# Altium PCB Relay-Switching-Board-v2.0.PcbDoc (part 1 of 5)
Units mil, origin at the board's own origin, x right, y up, seen from the top; angles counter-clockwise.
Board outline 5905.51 x 4330.71 mil, 4 copper layers (Top Layer, Layer 1, Layer 2, Bottom Layer), stack 62.047 mil thick; 211 components, 133 nets, 602 pads, 336 vias.
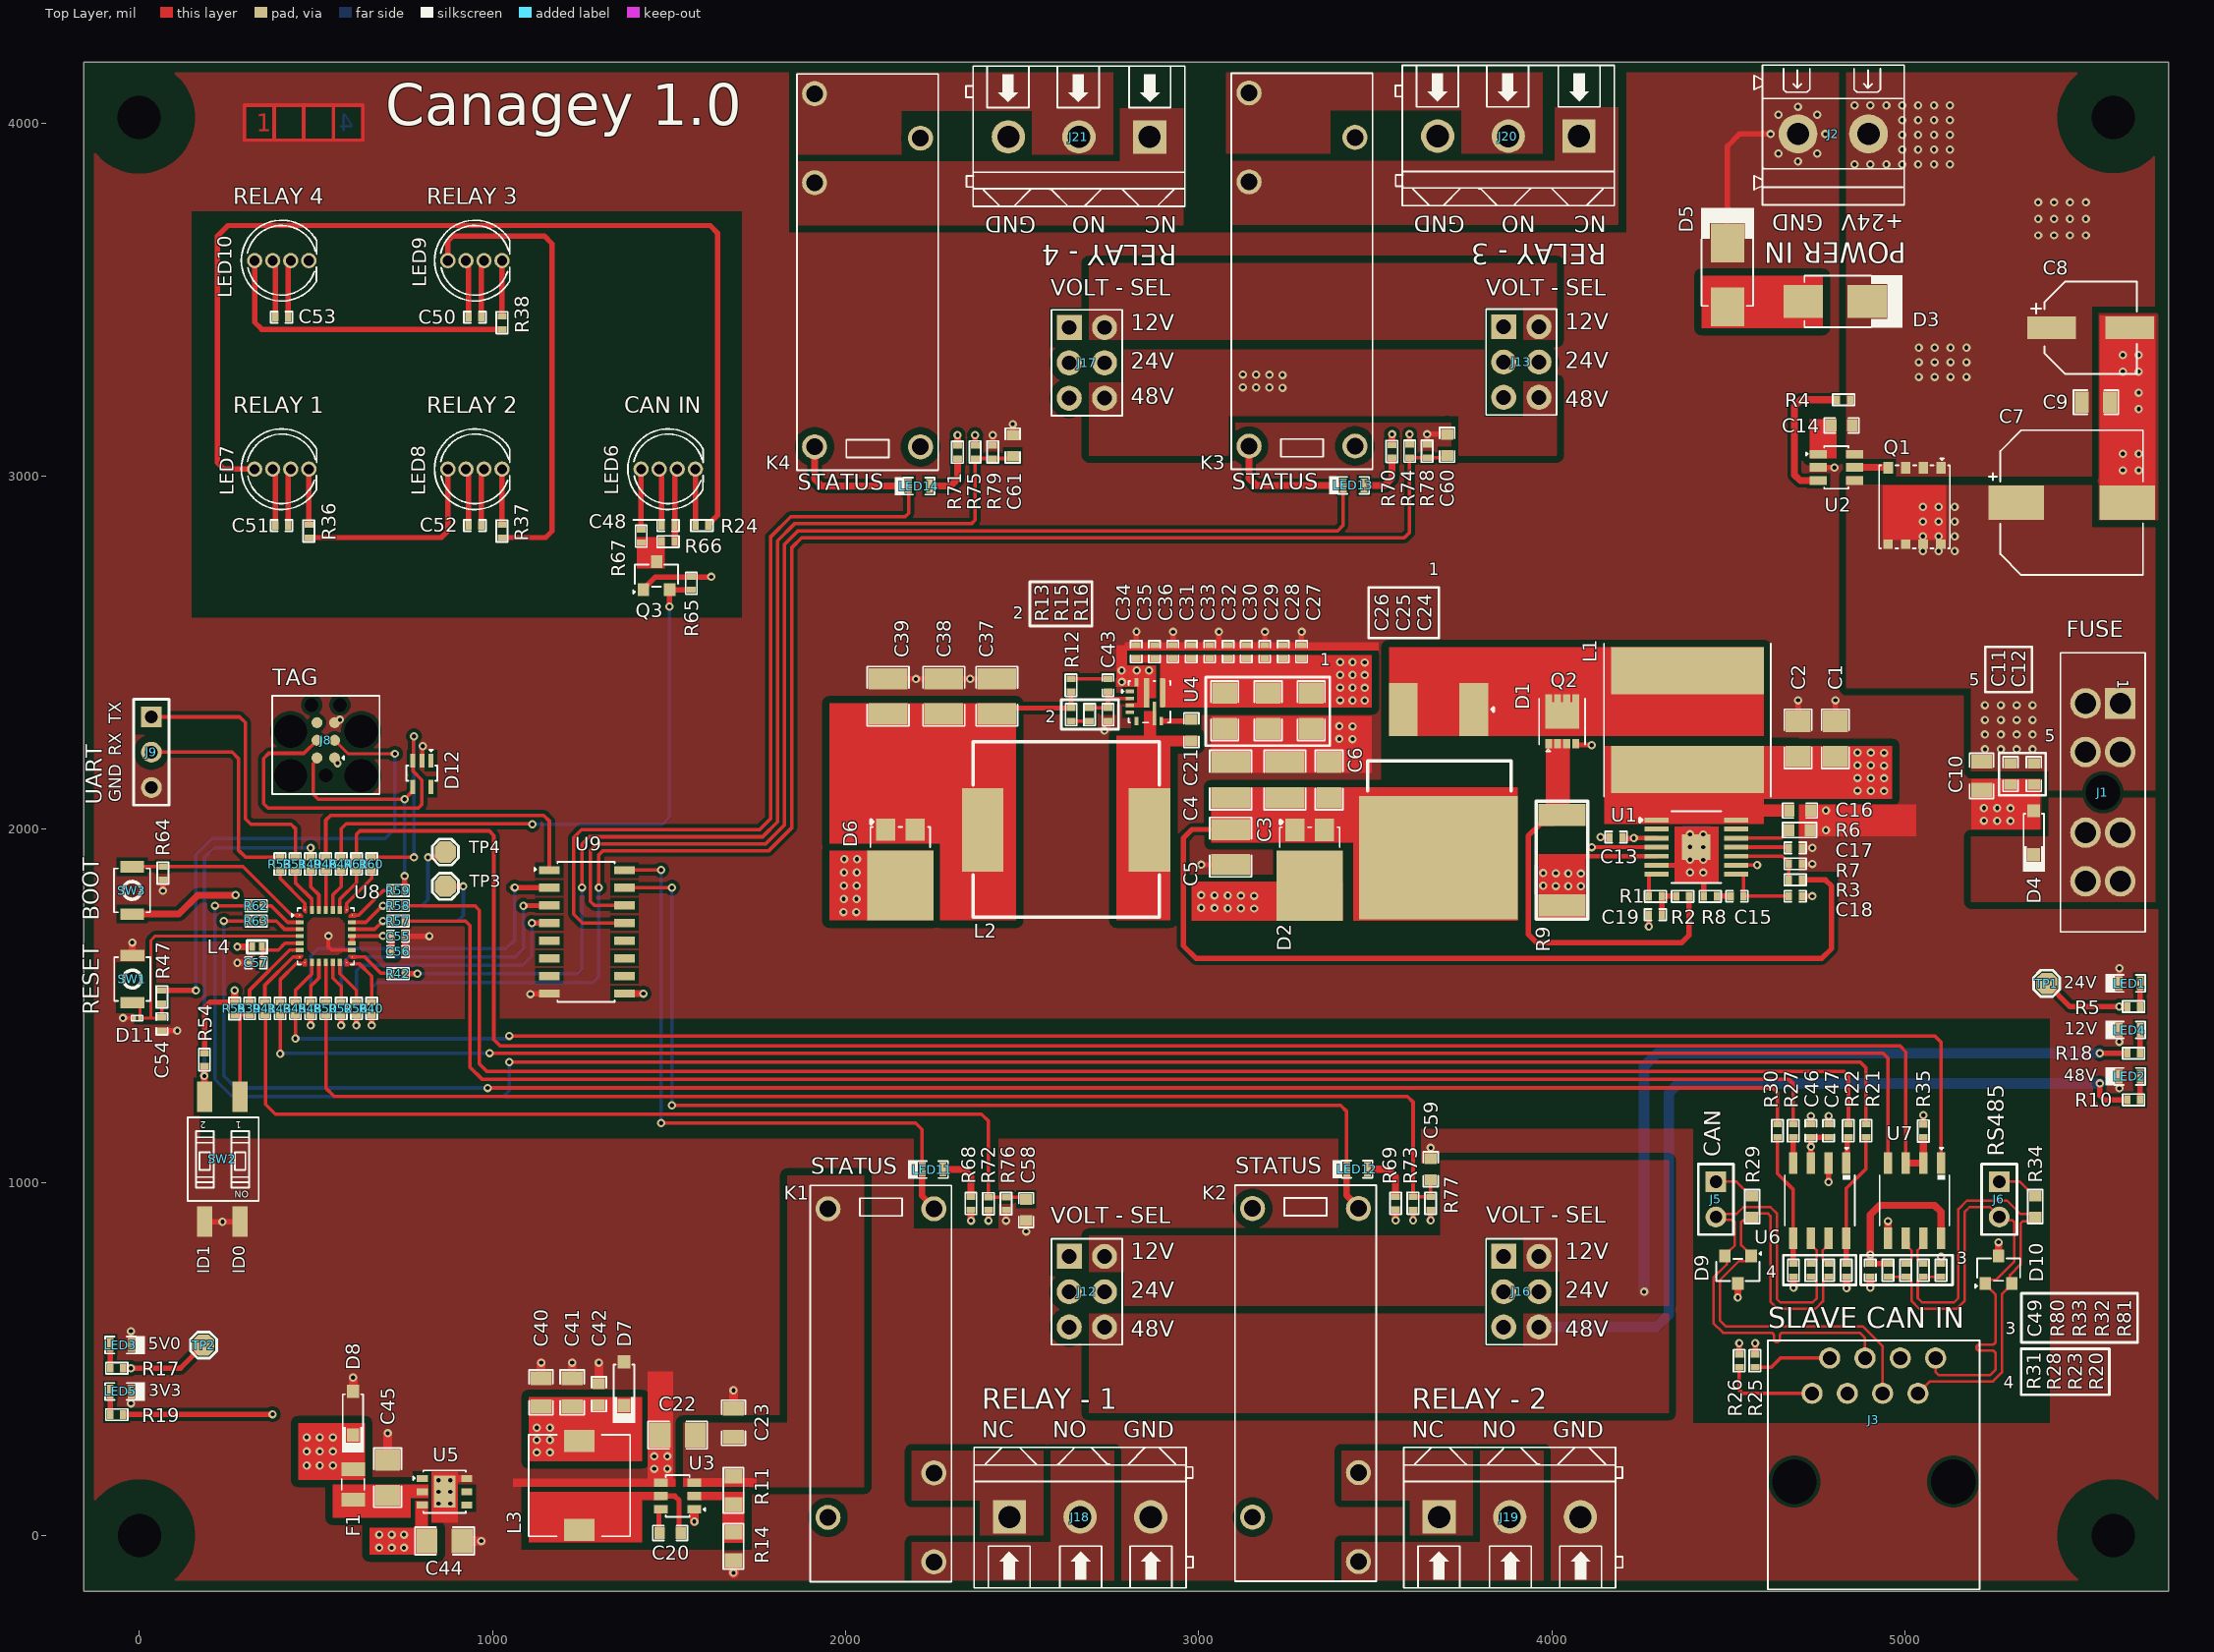
[diagram p0: Top Layer view]
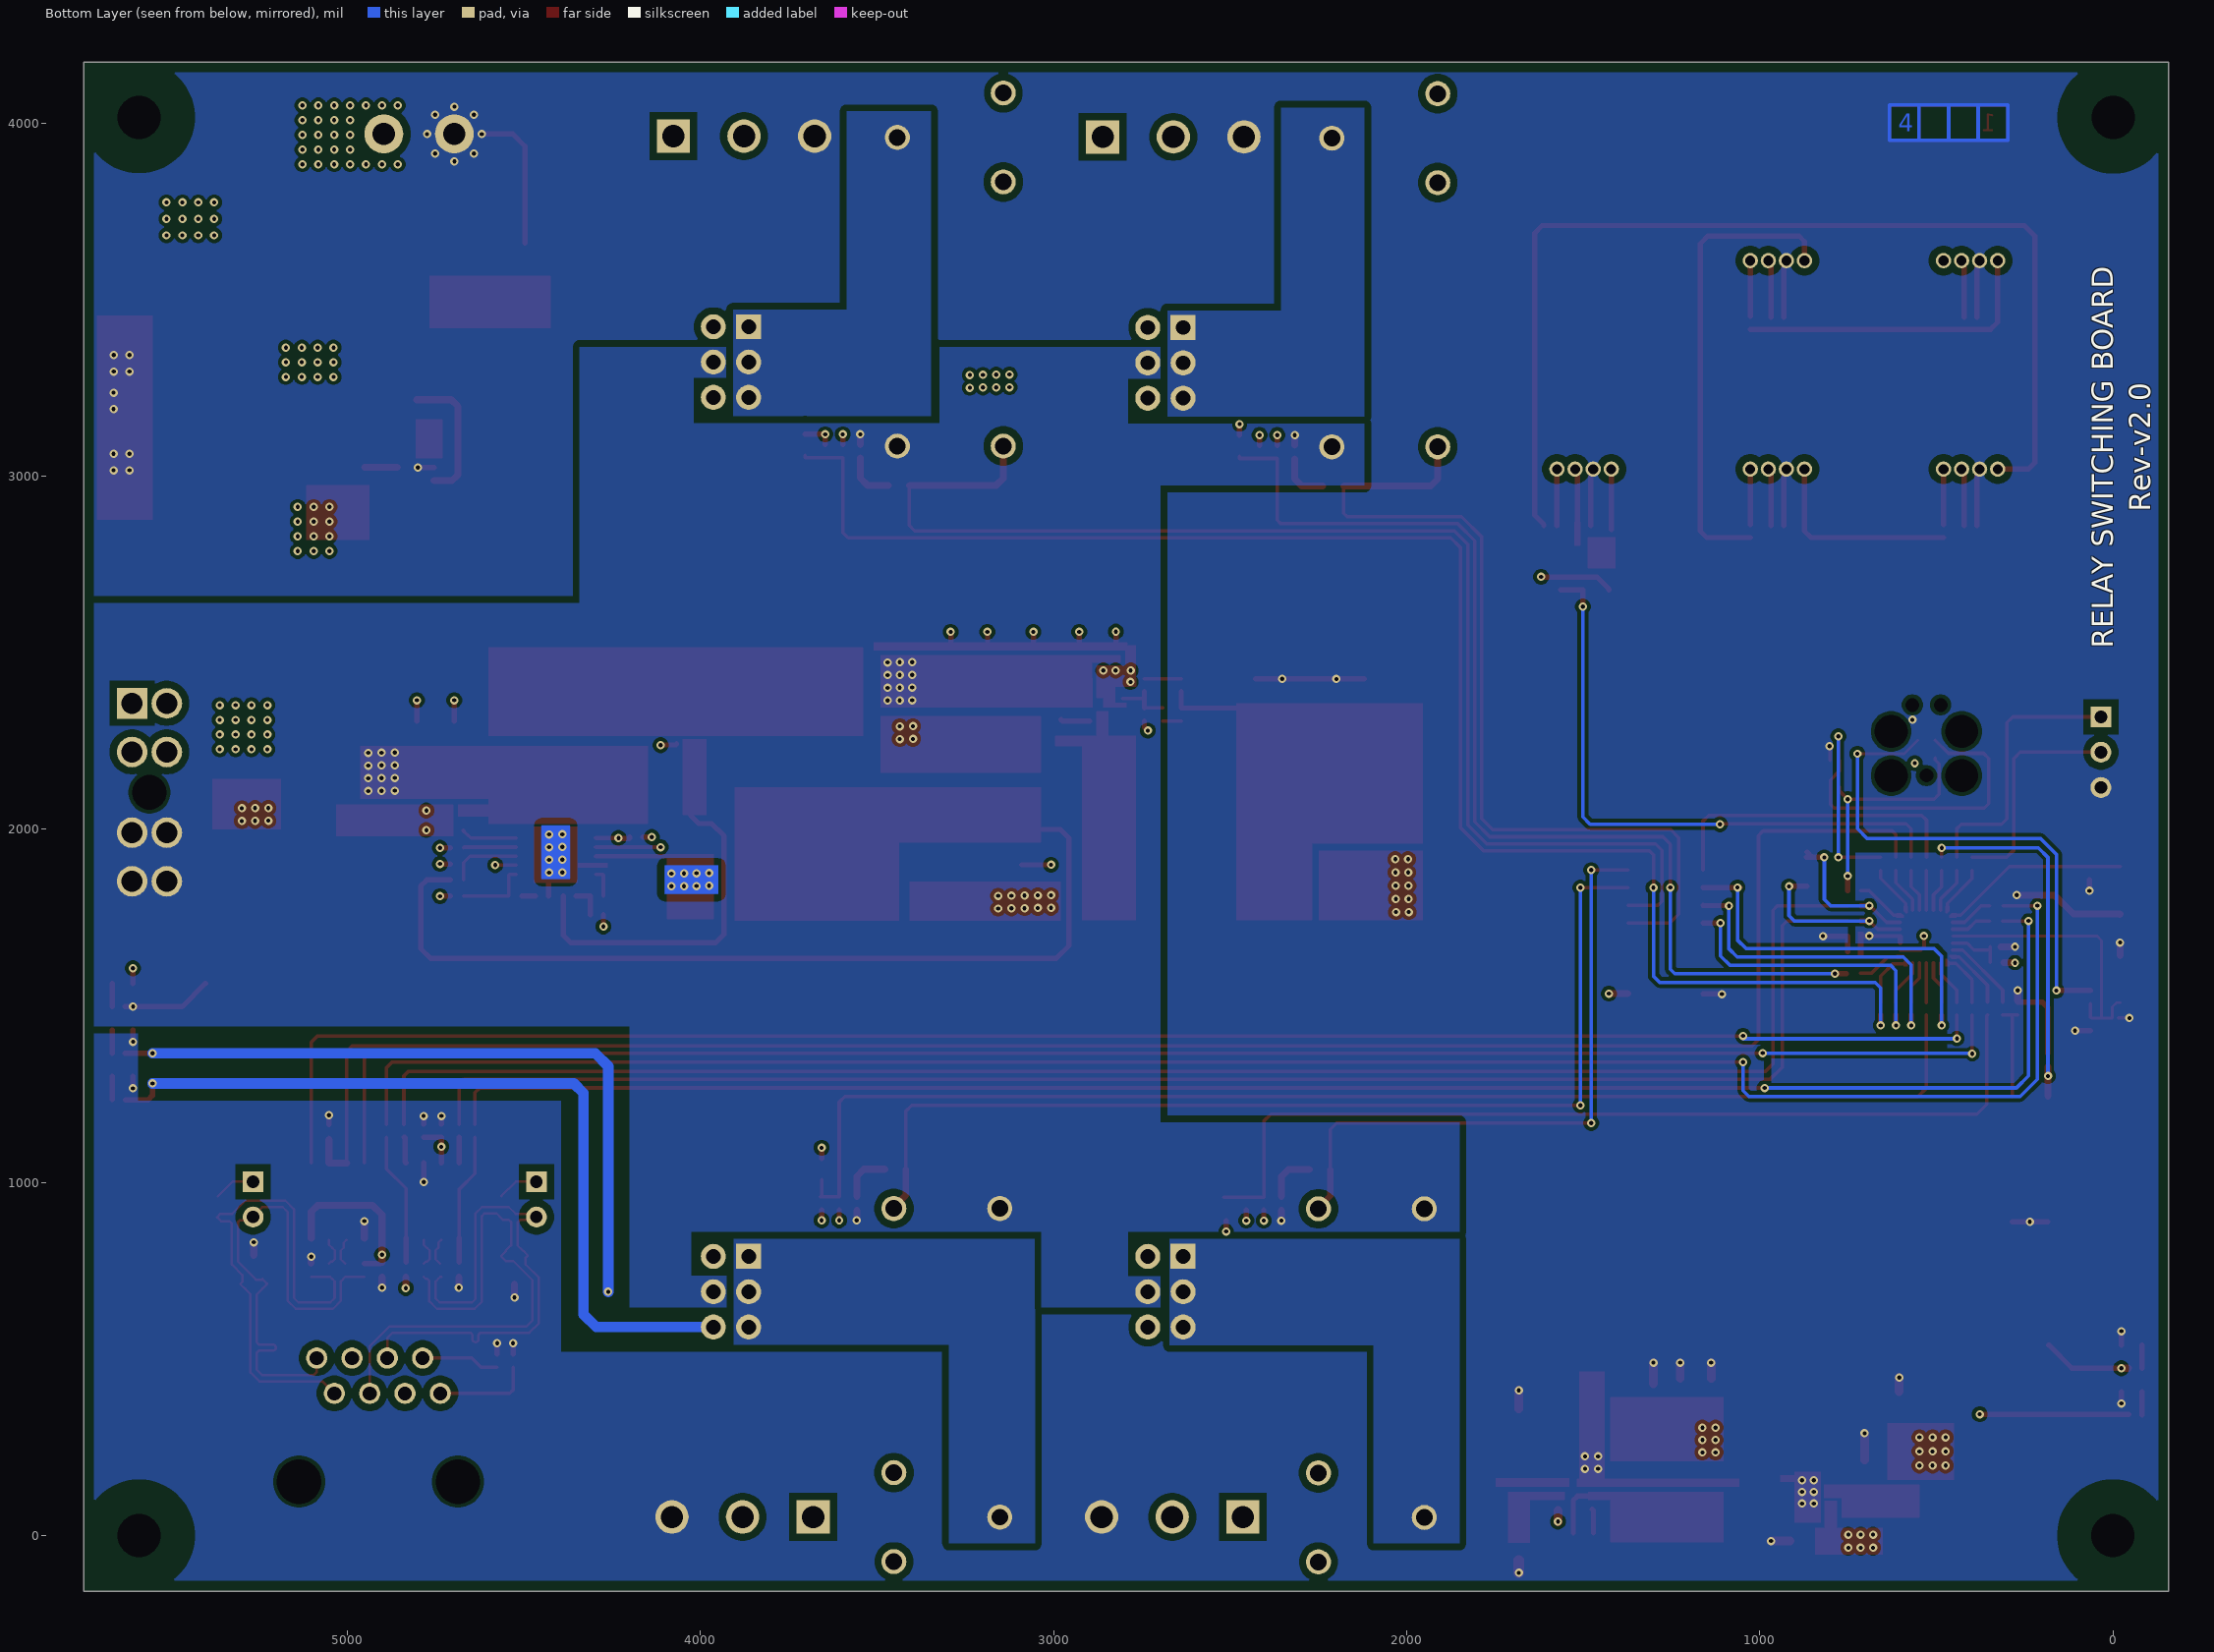
[diagram p1: Bottom Layer view, seen from below]
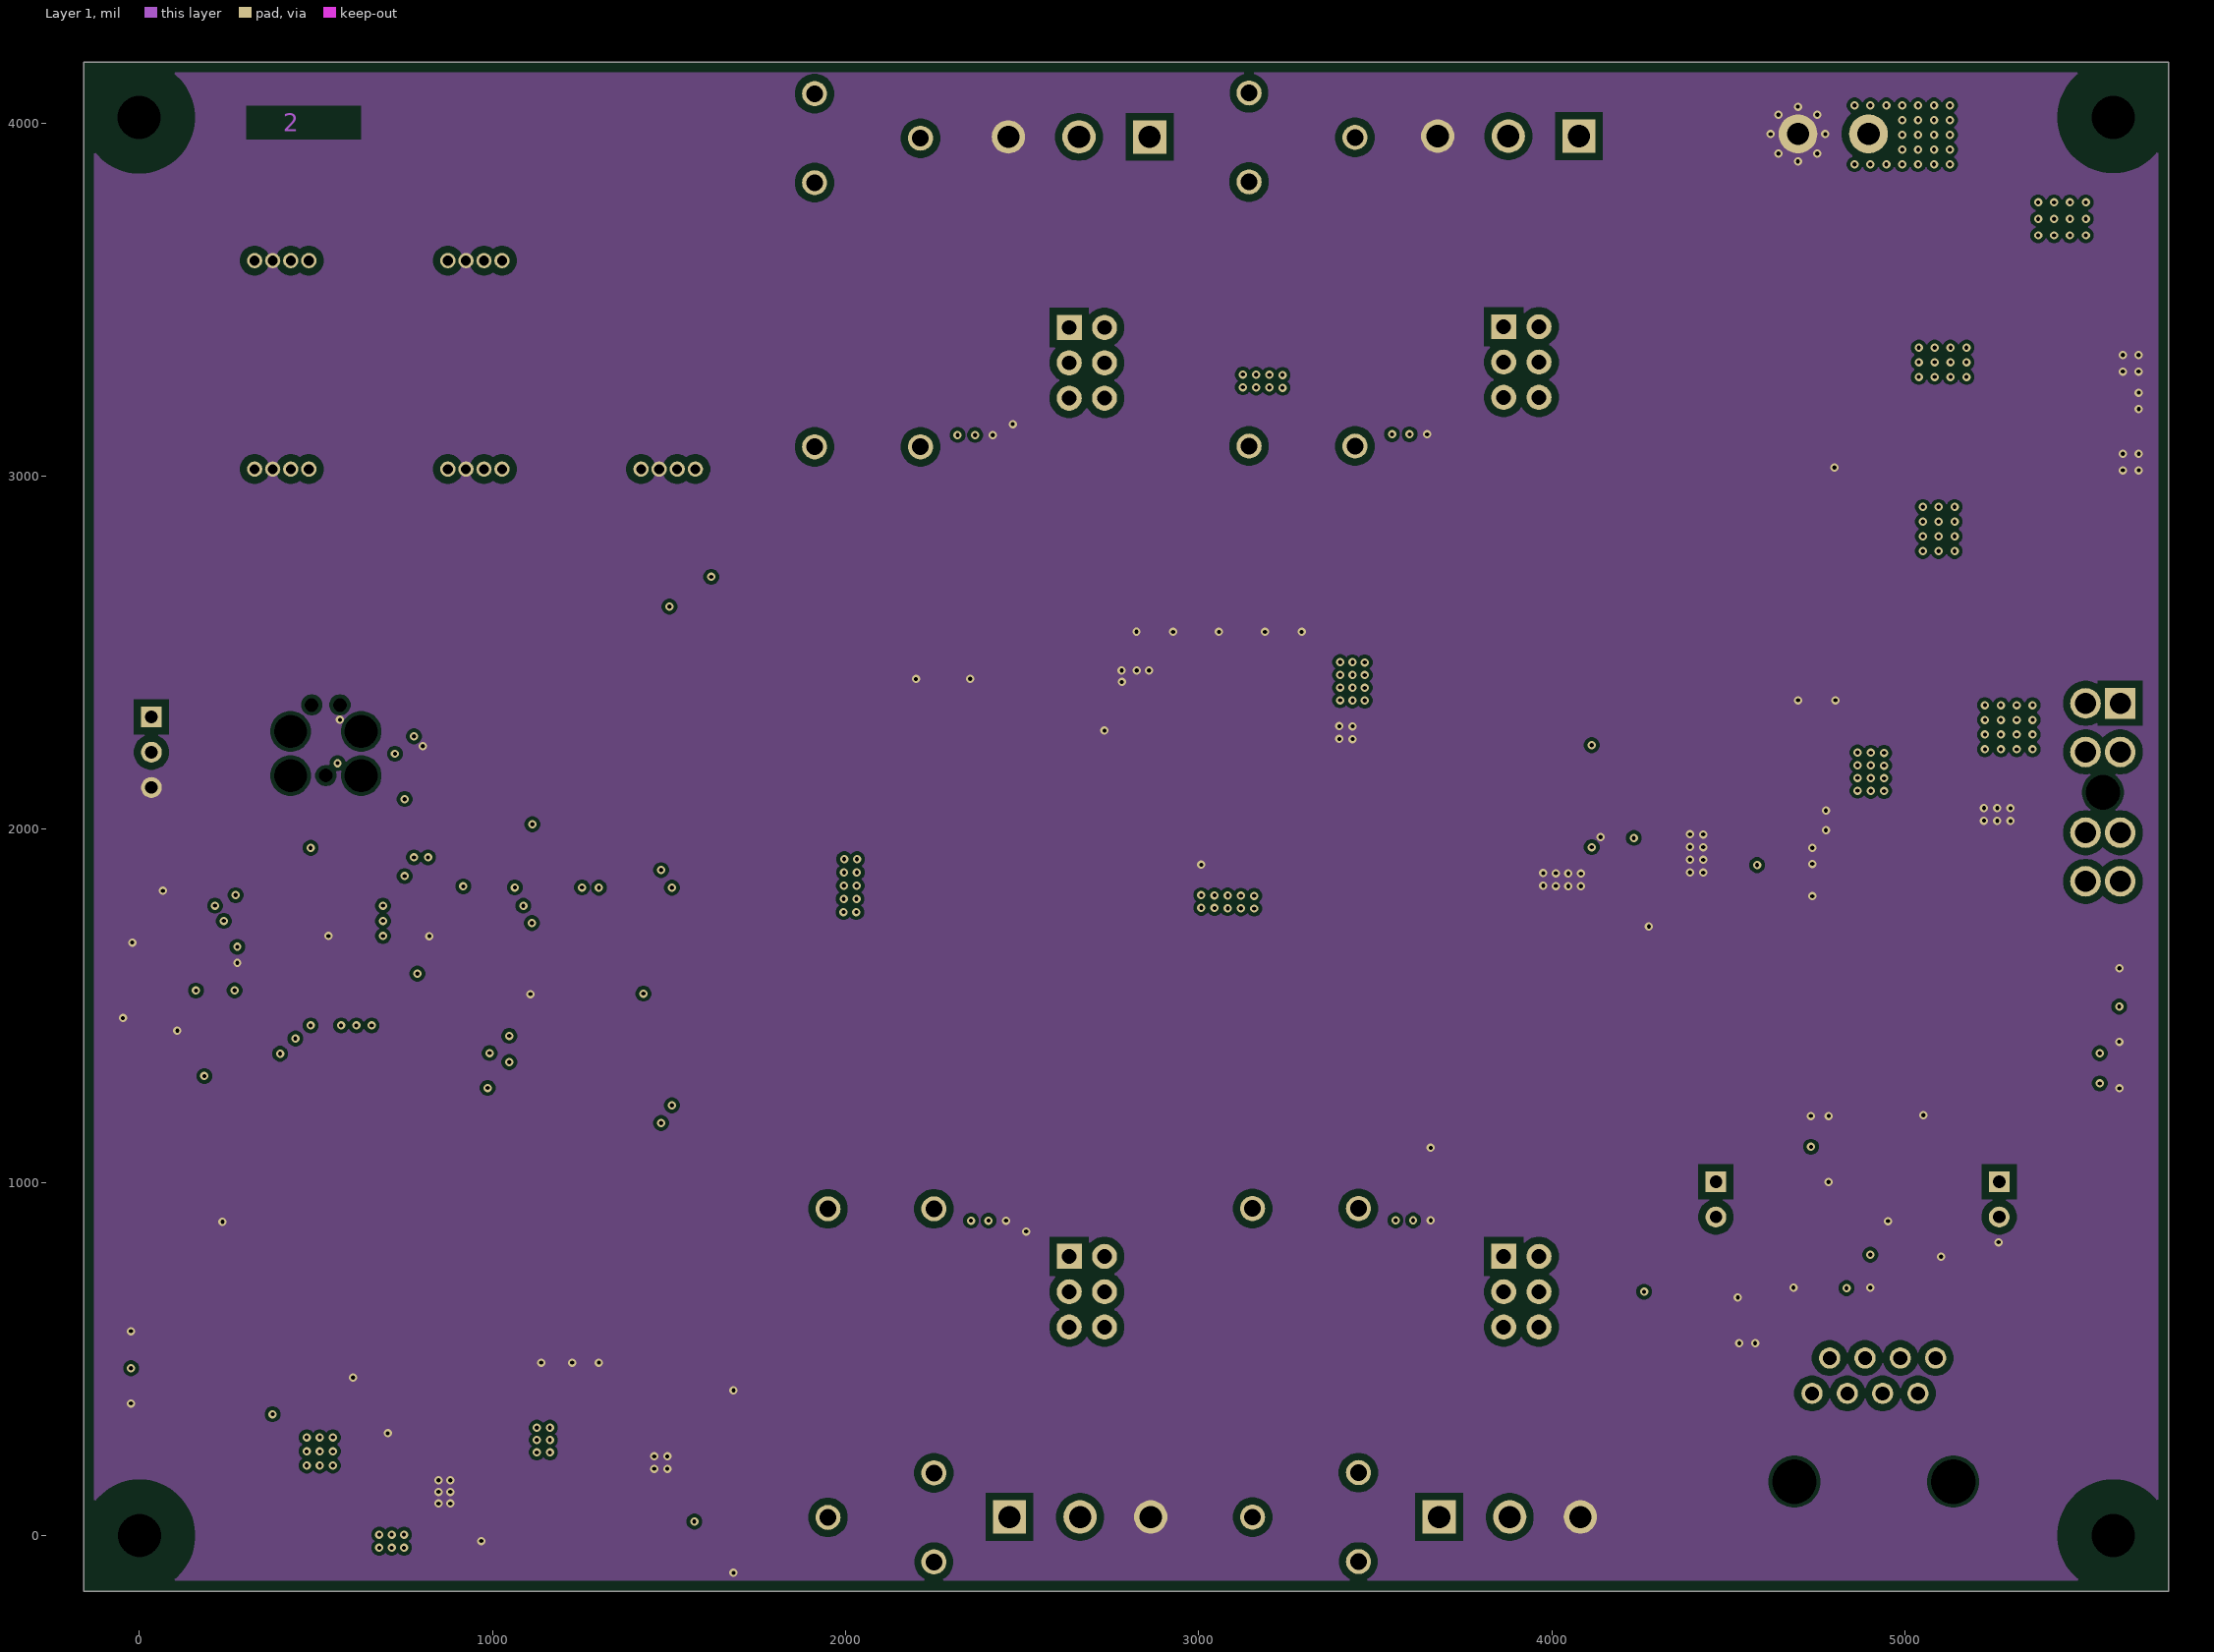
[diagram p2: Layer 1]
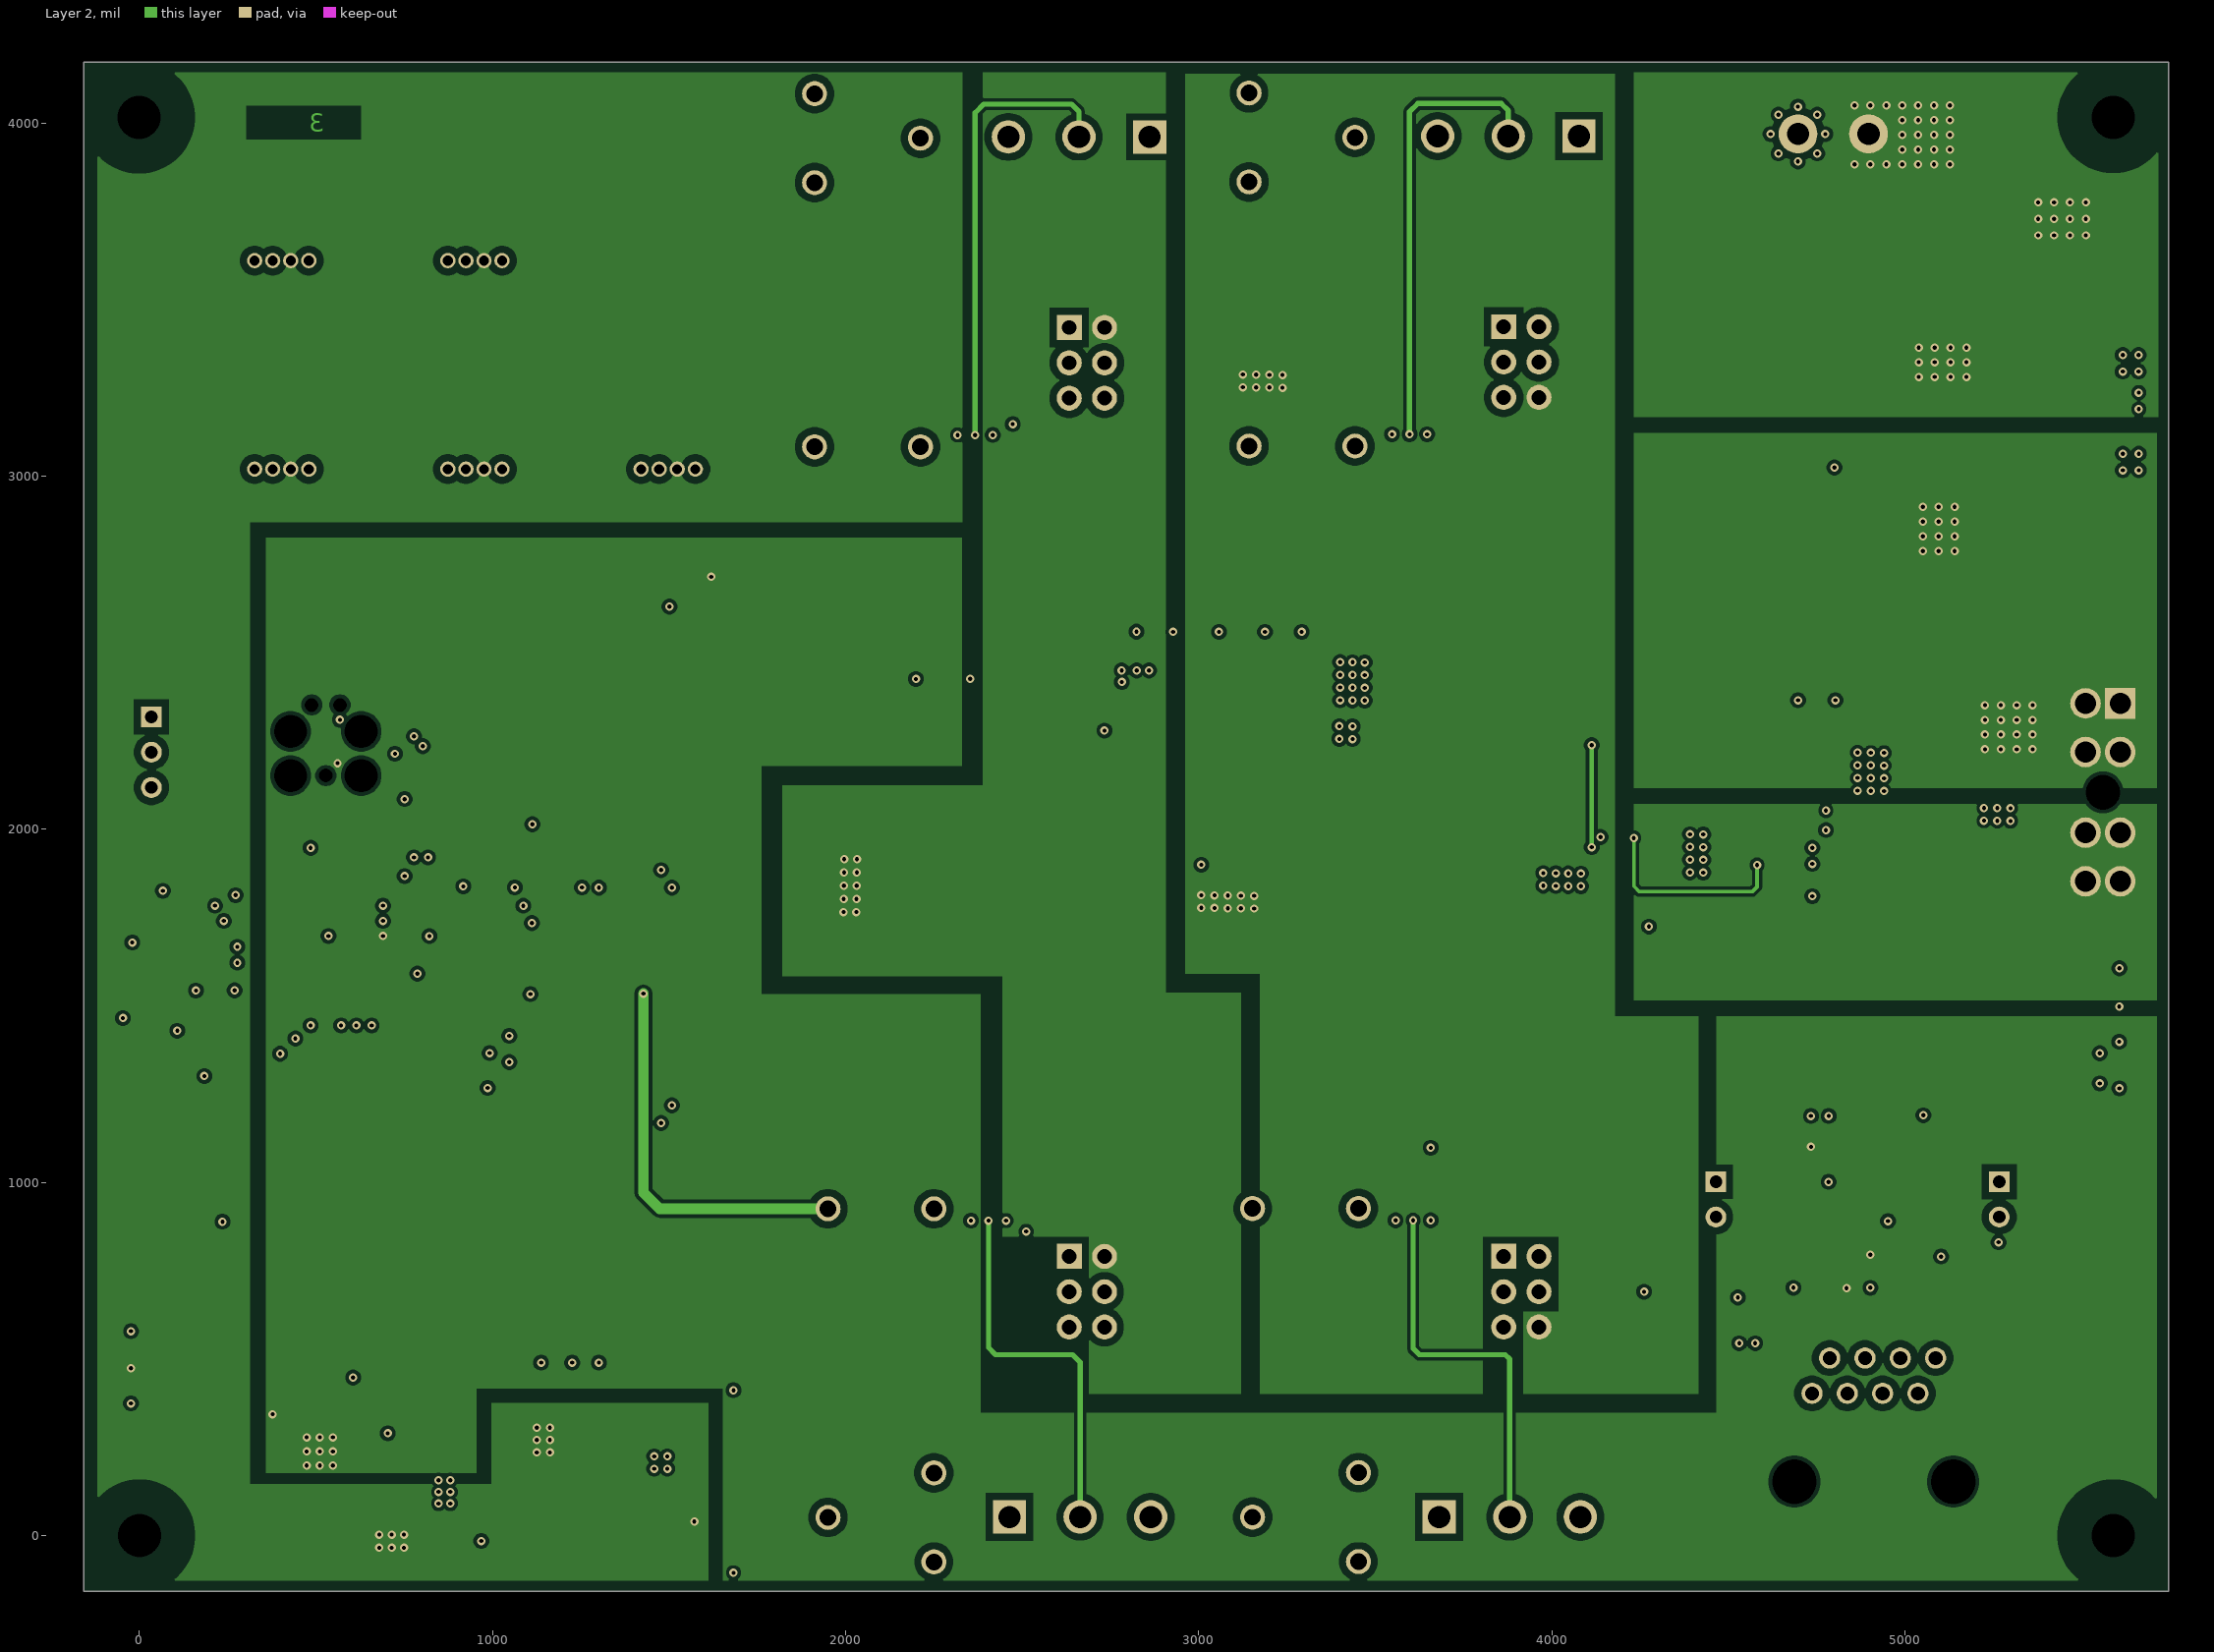
[diagram p3: Layer 2]
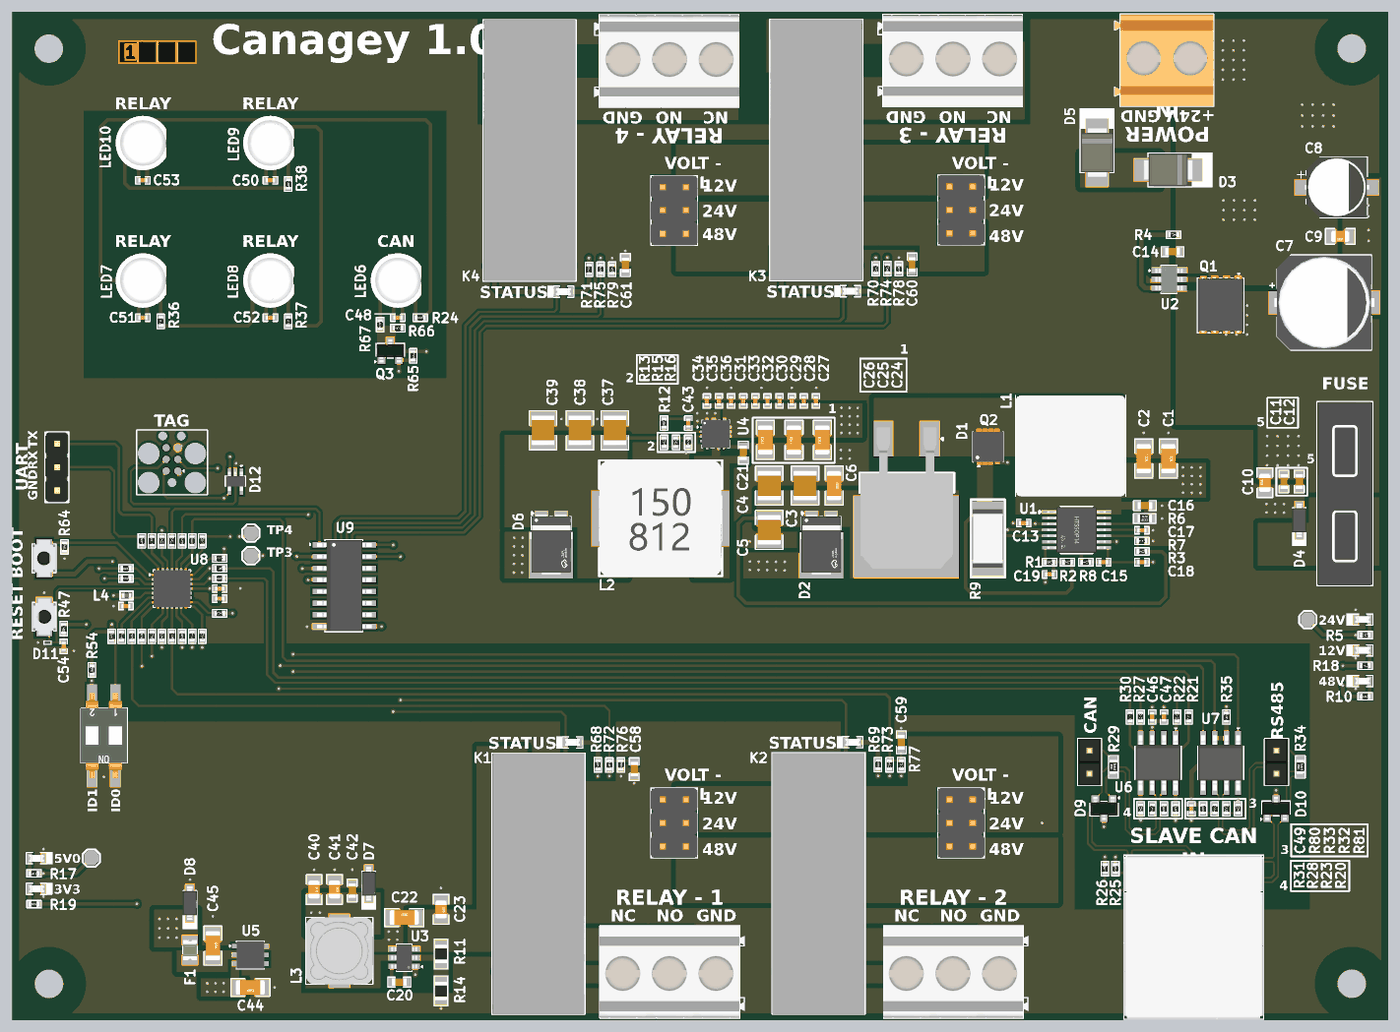
[diagram p6: 3D render of the assembled board from above, using the file's embedded part models]

## Layer stack, top to bottom
Top Solder: solder mask 0.4, Solder Resist, Dk 3.5
Top Layer: signal copper 1.378
Dielectric 2: prepreg 7.992, PP-006, Dk 4.4
Layer 1: signal copper 1.378
Dielectric 1: dielectric 40.551, FR-4, Dk 4.6
Layer 2: signal copper 1.378
Dielectric 3: prepreg 7.992, PP-006, Dk 4.4
Bottom Layer: signal copper 1.378
Bottom Solder: solder mask 0.4, Solder Resist, Dk 3.5

## Board outline
-158.22,-157.48 -158.22,4173.23 5747.3,4173.23 5747.3,-157.48

## Design rules (kind name [scope] priority, off if disabled: settings)
BoardOutlineClearance [All] p1: gap=0 ignorepadtopadclearanceinfootprint=FALSE except(10: Arc-OutlineEdge SMDPad-OutlineEdge THPad-OutlineEdge Via-OutlineEdge Fill-OutlineEdge; 30: Poly-OutlineEdge)
Clearance Clearance_DIFF [InAnyDifferentialPair] p1: gap=10 ignorepadtopadclearanceinfootprint=FALSE except(6: Arc-SMDPad Track-SMDPad SMDPad-SMDPad; 7: Arc-Fill Track-Via Track-Fill Track-Region Track-Text SMDPad-Fill SMDPad-Region THPad-THPad Fill-Fill; 8: Region-Region; 20: THPad-Poly Fill-Poly Poly-Poly Poly-Region)
Clearance [All] p2: gap=10 ignorepadtopadclearanceinfootprint=FALSE except(4: SMDPad-SMDPad; 6: Arc-SMDPad Track-SMDPad; 7: Arc-Fill Track-Track Track-Via Track-Fill Track-Region Track-Text SMDPad-Fill SMDPad-Region THPad-THPad Fill-Fill; 8: Region-Region; 20: THPad-Poly Fill-Poly Poly-Poly Poly-Region)
DiffPairsRouting DIFF_CAN1 [InDifferentialPairClass('DIFF_CAN')] p1: maxlimit=15 minlimit=11 mostfreqgap=15 toplayer_maxgap=11 toplayer_prefgap=11 toplayer_minwidth=7 toplayer_maxwidth=7 toplayer_prefwidth=7 midlayer1_mingap=15 midlayer1_minwidth=4 midlayer1_maxwidth=4 midlayer1_prefwidth=4 midlayer2_mingap=15 midlayer2_minwidth=4 midlayer2_maxwidth=4 midlayer2_prefwidth=4 bottomlayer_maxgap=11 bottomlayer_prefgap=11 bottomlayer_minwidth=7 bottomlayer_maxwidth=7 bottomlayer_prefwidth=7 impedanceprofiledriven=TRUE impedanceprofileid={AF431588-A3C0-40A6-A26B-CB03469C8758} impedanceprofilevalue=120.000000 maxuncoupledlength=500
DiffPairsRouting DIFF_RS485 [InDifferentialPairClass('DIFF_RS485')] p2: maxlimit=15 minlimit=11 mostfreqgap=15 toplayer_maxgap=11 toplayer_prefgap=11 toplayer_minwidth=7 toplayer_maxwidth=7 toplayer_prefwidth=7 midlayer1_mingap=15 midlayer1_minwidth=4 midlayer1_maxwidth=4 midlayer1_prefwidth=4 midlayer2_mingap=15 midlayer2_minwidth=4 midlayer2_maxwidth=4 midlayer2_prefwidth=4 bottomlayer_maxgap=11 bottomlayer_prefgap=11 bottomlayer_minwidth=7 bottomlayer_maxwidth=7 bottomlayer_prefwidth=7 impedanceprofiledriven=TRUE impedanceprofileid={AF431588-A3C0-40A6-A26B-CB03469C8758} impedanceprofilevalue=120.000000 maxuncoupledlength=500
HoleSize [All] p1: absolutevalues=TRUE maxlimit=137.8 minlimit=1 maxpercent=80.000 minpercent=20.000
MinimumSolderMaskSliver [All] p1: minsoldermaskwidth=0
PolygonConnect [All] p1: connectstyle=Direct reliefconductorwidth=10 reliefentries=4 polygonreliefangle="90 Angle" airgapwidth=10
RoutingVias [All] p1: holewidth=11.81 width=23.62 viastyle="Through Hole" minholewidth=7.87 minwidth=15.75 maxholewidth=11.81 maxwidth=23.62
SilkToSilkClearance [All] p1: silktosilkclearance=0
SilkToSolderMaskClearance [IsPad] p1: minsilkscreentomaskgap=0 clearancetoexposedcopper=TRUE
SolderMaskExpansion [All] p1: expansion=4 istentingtop=FALSE
SupplyNets "Schematic Supply Nets_11" [InNet('REL-PWR-1')] p1: voltage=0.000
SupplyNets "Schematic Supply Nets_10" [InNet('REL-PWR-3')] p2: voltage=0.000
SupplyNets "Schematic Supply Nets_5" [InNet('REL-PWR-4')] p3: voltage=0.000
SupplyNets "Schematic Supply Nets_2" [InNet('REL-PWR-2')] p4: voltage=0.000
SupplyNets "Schematic Supply Nets_1" [InNet('12V')] p5: voltage=0.000
SupplyNets "Schematic Supply Nets" [InNet('48V')] p6: voltage=0.000
SupplyNets "Schematic Supply Nets_9" [InNet('3V3')] p7: voltage=0.000
SupplyNets "Schematic Supply Nets_8" [InNet('VIN')] p8: voltage=0.000
SupplyNets "Schematic Supply Nets_7" [InNet('GND')] p9: voltage=0.000
SupplyNets "Schematic Supply Nets_6" [InNet('24V')] p10: voltage=0.000
SupplyNets "Schematic Supply Nets_4" [InNet('5V')] p11: voltage=0.000
SupplyNets "Schematic Supply Nets_3" [InNet('AVDD')] p12: voltage=0.000
Width [All] p1: maxlimit=50 minlimit=4 preferedwidth=6 minimp=50.000000 maximp=50.000000 favimp=50.000000
25 further rules are at their usual default settings.

## Classes and differential pairs
component class U_Relay-Sheet: C58 C59 C60 C61 J12 J13 J15 J16 J17 J18 J19 J20 J21 K1 K2 K3 K4 LED11 LED12 LED13 LED14 R68 R69 R70 R71 R72 R73 R74 R75 R76 R77 R78 R79 U9
component class U_Controller-Sheet: C54 C55 C56 C57 D11 D12 J8 J9 L4 Q3 R39 R40 R41 R42 R43 R44 R45 R46 R47 R48 R49 R50 R51 R52 R53 R54 R55 R56 R57 R58 R59 R60 R61 R62 R63 R64 R65 R66 R67 SW1 SW2 SW3 TP3 TP4 U8
differential pair class DIFF_RS485: RS485
differential pair class DIFF_CAN: CAN1
component class U_Power-Sheet: C1 C2 C3 C4 C5 C6 C7 C8 C9 C10 C11 C12 C13 C14 C15 C16 C17 C18 C19 C20 C21 C22 C23 C24 C25 C26 C27 C28 C29 C30 C31 C32 C33 C34 C35 C36 C37 C38 C39 C40 C41 C42 C43 C44 C45 D1 D2 D3 D4 D5 D6 D7 D8 F1 J1 J2 L1 L2 L3 LED1 LED2 LED3 LED4 LED5 Q1 Q2 R1 R2 R3 R4 R5 R6 R7 R8 R9 R10 R11 R12 R13 R14 R15 R16 R17 R18 R19 TP1 TP2 U1 U2 U3 U4 U5
component class U_Comms-Sheet: C46 C47 C48 C49 C50 C51 C52 C53 D9 D10 J3 J5 J6 LED6 LED7 LED8 LED9 LED10 R20 R21 R22 R23 R24 R25 R26 R27 R28 R29 R30 R31 R32 R33 R34 R35 R36 R37 R38 R80 R81 U6 U7
differential pair RS485: +RS485_P -RS485_N
differential pair CAN1: +CAN1_P -CAN1_N

## Components (designator, comment, footprint, x,y, rotation, side; value= is the part's Value field where it differs from the comment)
C1 "4.7uF" Cap-1206 4803.16,2255.88 r270 top
C2 "4.7uF" Cap-1206 4697.57,2255.88 r270 top
C3 "10uF" Cap-1210 3244.39,2139.54 r270 top
C4 "10uF" Cap-1210 3090.4,2139.53 r270 top
C5 "10uF" Cap-1210 3090.4,1949.62 r90 top
C6 "1uF" Cap-1206 3369.22,2139.53 r270 top
C7 "220uF" UCD-220uF-10mmDia 5472.2,2925.26 r0 top
C8 "47uF" RVT1H470M0607 5526.24,3420.47 r0 top
C9 "22nF" Cap-0805 5540.97,3209.77 r180 top
C10 "10uF" Cap-0805 5217.29,2151.77 r90 top
C11 "1uF" Cap-0603 5298.98,2156.77 r90 top
C12 "0.1uF" Cap-0603 5364.99,2156.76 r90 top value=100nF
C13 "1uF" Cap-0402 4182.26,1978.12 r0 top
C14 "1uF" Cap-0603 4821.19,3143.98 r0 top
C15 "33nF" Cap-0402 4524.66,1810.66 r0 top
C16 "0.1uF" Cap-0603 4702.57,2053.45 r180 top value=100nF
C17 "0.1uF" Cap-0402 4689.57,1947.51 r180 top
C18 "68nF" Cap-0402 4689.57,1810.66 r180 top
C19 "1nF" Cap-0402 4293.48,1757.88 r0 top
C20 "0.1uF" Cap-0603 1503.09,7.6 r180 top value=100nF
C21 "100nF" Cap-0603 2979.12,2280.57 r90 top
C22 "4.7uF" Cap-1206 1524.41,284.53 r0 top
C23 "10uF" Cap-0805 1682.37,319.54 r270 top
C24 "4.7uF" Cap-1206 3318.62,2335.61 r90 top
C25 "4.7uF" Cap-1206 3196.75,2335.61 r90 top
C26 "4.7uF" Cap-1206 3073.75,2335.61 r90 top
C27 "10nF" Cap-0402 3291.11,2503.03 r270 top
C28 "10nF" Cap-0402 3239.09,2503.08 r270 top
C29 "10nF" Cap-0402 3187.06,2503.08 r270 top
C30 "10nF" Cap-0402 3135.04,2503.04 r270 top
C31 "10nF" Cap-0402 2978.96,2503.08 r270 top
C32 "10nF" Cap-0402 3083.01,2503.05 r270 top
C33 "10nF" Cap-0402 3030.99,2503.06 r270 top
C34 "10nF" Cap-0402 2822.88,2503.08 r270 top
C35 "10nF" Cap-0402 2874.91,2503.07 r270 top
C36 "10nF" Cap-0402 2926.93,2503.08 r270 top
C37 "22uF" Cap-1210 2428.16,2376.76 r270 top
C38 "22uF" Cap-1210 2278.16,2376.76 r270 top
C39 "22uF" Cap-1210 2120.13,2376.76 r270 top
C40 "22uF" Cap-0805 1137.61,405.46 r270 top
C41 "22uF" Cap-0805 1225.61,405.46 r270 top
C42 "0.1uF" Cap-0603 1301.24,400.46 r270 top value=100nF
C43 "100pF" Cap-0402 2743.15,2408.06 r90 top
C44 "4.7uF" Cap-1206 864.15,-15.3 r180 top
C45 "4.7uF" Cap-1206 703.4,164.04 r270 top
C46 "0.1uF" Cap-0402 4733.49,1146.34 r270 top value=100nF
C47 "4.7uF" Cap-0402 4784,1146.34 r270 top
C48 "0.1uF" Cap-0402 1497.28,2860.63 r0 top value=100nF
C49 "0.1uF" Cap-0402 4902,751.33 r90 top value=100nF
C50 "0.1uF" Cap-0402 950.17,3450.64 r0 top value=100nF
C51 "0.1uF" Cap-0402 403.05,2860.63 r0 top value=100nF
C52 "0.1uF" Cap-0402 950.17,2860.63 r0 top value=100nF
C53 "0.1uF" Cap-0402 403.04,3450.63 r0 top value=100nF
C54 "0.1uF" Cap-0402 63.48,1449.02 r90 top value=100nF
C55 "0.1uF" Cap-0402 732.76,1697.44 r0 top value=100nF
C56 "0.1uF" Cap-0402 732.77,1654.26 r0 top value=100nF
C57 "0.1uF" Cap-0402 330.26,1622.26 r180 top value=100nF
C58 "0.1uF" Cap-0603 2511.22,921.97 r90 top
C59 "0.1uF" Cap-0603 3656.95,1037.49 r270 top
C60 "0.1uF" Cap-0603 3703.68,3088.85 r270 top
C61 "0.1uF" Cap-0603 2473.28,3086.71 r270 top
D1 "STPS20M100SG-TR" D2Pak. 3679.26,2129.53 r180 top
D2 "V25PN60-M3/86A" TO-277A 3314.26,1919.49 r90 top
D3 "SMBJ58A-13-F" SMB_ 4802.47,3494.95 r0 top
D4 "AZ4024-01G" SOD-123 5364.99,1990.63 r270 top
D5 "SMBJ26A-13-F" SMB_ 4497.29,3569.63 r90 top
D6 "V25PN60-M3/86A" TO-277A 2155.09,1919.79 r90 top
D7 "AZ3005-01G" SOD-123 1372.26,429.96 r270 top
D8 "AZ3003-01G" SOD-123 604.64,346.23 r270 top
D9 "CDSOT23-T24CAN-Q" SOT-23 4527.07,752.72 r180 top
D10 "SM712" SOT-23 5265.29,752.72 r0 top
D11 "ESDM2033MX4T5G" DFN-2(0.3x0.6) -6.77,1465.51 r0 top
D12 "ESDALC6V1W5" SOT-323-5 800.02,2157.44 r270 top
F1 "0805L110SLYR" Fuse-0805 605.14,144.93 r90 top
J1 "178.6165.0002" 178.6165.0002 5560.76,2104.8 r270 top
J2 "DB128L-5.08-2P-OG-S" DB128L-5.08-2P-OG-S 4796.96,3969.34 r0 top
J3 "HC-RJ45-5622-1-6-Y" HC-RJ45-5622-1-6-Y 4911.95,327.73 r0 top
J5 "X6511WV-02H-C60D30" HDR1X2_ 4464.73,1002.24 r270 top
J6 "X6511WV-02H-C60D30" HDR1X2_ 5266.95,1002.24 r270 top
J8 "TC2030-IDC" TC2030-IDC_ 528.02,2252.22 r90 top
J9 "X6511WV-03H-C60D30" HDR1X3_ 34.02,2318.5 r270 top
J12 "X6521WV-2x03H-C60D30" X6521WV-2x03H-C60D30 2683.27,690.57 r270 top
J13 "X6521WV-2x03H-C60D30" X6521WV-2x03H-C60D30 3913.68,3323.26 r270 top
J16 "X6521WV-2x03H-C60D30" X6521WV-2x03H-C60D30 3913.68,690.57 r270 top
J17 "X6521WV-2x03H-C60D30" X6521WV-2x03H-C60D30 2683.27,3321.12 r270 top
J18 "DB128L-5.08-3P-GY-S" DB128L-5.08-3P-GY-S 2664,52.77 r0 top
J19 "DB128L-5.08-3P-GY-S" DB128L-5.08-3P-GY-S 3880.84,52.77 r0 top
J20 "DB128L-5.08-3P-GY-S" DB128L-5.08-3P-GY-S 3876.88,3963.06 r180 top
J21 "DB128L-5.08-3P-GY-S" DB128L-5.08-3P-GY-S 2660.9,3960.92 r180 top
K1 "G6RN-1-DC24" "G6RN-1 DC24" 2100.07,425.46 r0 top
K2 "G6RN-1-DC24" "G6RN-1 DC24" 3302.49,426.31 r0 top
K3 "G6RN-1-DC24" "G6RN-1 DC24" 3292.54,3585.37 r180 top
K4 "G6RN-1-DC24" "G6RN-1 DC24" 2062.13,3583.23 r180 top
L1 "15uH" FEXL1010A-150M 4384.26,2309.53 r90 top
L2 "6.8uH" MWSA1206S-6R8MT 2624.38,1998.53 r180 top
L3 "4.7uH" YPRH0703-4R7M 1245.87,141.61 r90 top
L4 "BLM15AG601SN1D" IND-0402 333.26,1667.45 r180 top
LED1 "RED" LED-0603 5636.77,1563.93 r180 top
LED2 "RED" LED-0603 5636.78,1300.22 r180 top
LED3 "RED" LED-0603 -53.18,539.63 r0 top
LED4 "RED" LED-0603 5636.77,1431.94 r180 top
LED5 "RED" LED-0603 -53.18,407.91 r0 top
LED6 "WS2812D-F5" WS2812D-F5 1497.53,3020.08 r0 top
LED7 "WS2812D-F5" WS2812D-F5 403.04,3020.08 r0 top
LED8 "WS2812D-F5" WS2812D-F5 950.28,3020.08 r0 top
LED9 "WS2812D-F5" WS2812D-F5 950.28,3610.63 r0 top
LED10 "WS2812D-F5" WS2812D-F5 403.04,3610.63 r0 top
LED11 "Blue" LED-0603 2246.23,1036.63 r180 top
LED12 "Blue" LED-0603 3448.65,1037.49 r180 top
LED13 "Blue" LED-0603 3438.54,2974.19 r180 top
LED14 "Blue" LED-0603 2208.13,2972.06 r180 top
Q1 "CSD18531Q5A" "8-VSONP (5x6)" 5027.2,2915.72 r270 top
Q2 "CSD19537Q3" "8-VSON-CLIP (3.3x3.3)" 4029.26,2305.53 r90 top
Q3 "Si2302CDS" Sot-23 1464.42,2718.07 r0 top
R1 "348R" Res-0402 4293.52,1810.66 r0 top
R2 "100R" Res-0402 4370.42,1810.67 r0 top
R3 "120K" Res-0402 4689.57,1856.7 r0 top
R4 "100K" Res-0402 4826.19,3216.38 r180 top
R5 "3.9K" Res-0402 5647.72,1497.94 r0 top value=3.9kR
R6 "48.7K" Res-0603 4701.57,1997.91 r180 top
R7 "2.49K" Res-0402 4689.57,1902.11 r180 top value=2.49kR
R8 "2.94K" Res-0402 4448.83,1810.66 r0 top
R9 "12mR" RES-2512 4028.72,1912.49 r90 top
R10 "10K" Res-0402 5647.73,1234.5 r0 top
R11 "698K" RES-0805 1682.37,128.04 r90 top value=698kR
R12 "20K" Res-0402 2638.78,2408.07 r270 top value=20kR
R13 "2.87k" Res-0402 2638.78,2325.08 r90 top
R14 "51.1K" RES-0805 1682.23,-30.39 r90 top value=51.1kR
R15 "191K" Res-0402 2690.65,2325.08 r270 top value=191kR
R16 "10K" Res-0402 2743.16,2325.08 r90 top
R17 "499R" Res-0402 -64.12,473.9 r180 top
R18 "2K" Res-0402 5647.72,1366.21 r0 top value=2kR
R19 "240R" Res-0402 -64.12,342.18 r180 top
R20 "10K" Res-0402 4833.99,751.34 r270 top
R21 "0R" Res-0402 4889.99,1146.34 r270 top
R22 "0R" Res-0402 4839.99,1146.34 r270 top
R23 "0R" Res-0402 4784,751.34 r270 top
R24 "75R" Res-0402 1593.05,2860.63 r0 top
R25 "0R" Res-0402 4575.91,495 r270 top
R26 "0R" Res-0402 4530.91,495 r270 top
R27 "0R" Res-0402 4683.99,1146.34 r270 top
R28 "0R" Res-0402 4733.99,751.34 r270 top
R29 "120R" Res-0603 4567.11,931.77 r270 top
R30 "0R" Res-0402 4638.99,1146.34 r270 top
R31 "10K" Res-0402 4683.99,751.34 r90 top
R32 "0R" Res-0402 5052.29,751.33 r270 top
R33 "0R" Res-0402 5002.29,751.34 r270 top
R34 "120R" Res-0603 5369.32,931.77 r270 top
R35 "10K" Res-0402 5052.26,1145.85 r90 top
R36 "75R" Res-0402 479.82,2844.63 r270 top
R37 "75R" Res-0402 1026.94,2844.62 r270 top
R38 "75R" Res-0402 1027.06,3434.63 r270 top
R39 "0R" Res-0402 312.13,1492.69 r90 top
R40 "0R" Res-0402 657.55,1492.69 r90 top
R41 "0R" Res-0402 355.31,1492.69 r90 top
R42 "0R" Res-0402 732.76,1591.08 r180 top
R43 "0R" Res-0402 398.48,1492.69 r90 top
R44 "0R" Res-0402 571.2,1902.19 r270 top
R45 "0R" Res-0402 441.66,1492.69 r90 top
R46 "0R" Res-0402 528.02,1902.19 r270 top
R47 "0R" Res-0402 63.32,1525.29 r270 top
R48 "0R" Res-0402 484.84,1492.69 r90 top
R49 "0R" Res-0402 484.84,1902.19 r270 top
R50 "0R" Res-0402 528.02,1492.69 r90 top
R51 "0R" Res-0402 441.66,1902.19 r270 top
R52 "0R" Res-0402 571.19,1492.69 r90 top
R53 "0R" Res-0402 398.49,1902.19 r270 top
R54 "10K" Res-0402 184.31,1347.88 r90 top
R55 "10K" Res-0402 269.63,1492.49 r90 top
R56 "0R" Res-0402 614.37,1492.69 r90 top
R57 "0R" Res-0402 732.76,1740.61 r180 top
R58 "0R" Res-0402 732.76,1783.79 r180 top
R59 "0R" Res-0402 732.77,1826.97 r0 top
R60 "0R" Res-0402 657.55,1902.19 r90 top
R61 "0R" Res-0402 614.37,1902.19 r270 top
R62 "0R" Res-0402 330.26,1783.8 r0 top
R63 "0R" Res-0402 330.26,1740.62 r0 top
R64 "10K" Res-0402 66.62,1876.03 r90 top
R65 "10K" Res-0402 1563.29,2696.81 r90 top
R66 "10K" Res-0402 1497.28,2815.34 r0 top
R67 "75R" Res-0402 1421.01,2830.33 r90 top
R68 "3.9K" Res-0402 2355.04,940.48 r90 top value=3.9kR
R69 "3.9K" Res-0402 3557.45,941.34 r90 top value=3.9kR
R70 "3.9K" Res-0402 3547.5,3070.34 r270 top value=3.9kR
R71 "3.9K" Res-0402 2317.09,3068.21 r270 top value=3.9kR
R72 "137K" Res-0402 2404.77,939.97 r270 top value=137kR
R73 "137K" Res-0402 3607.19,940.83 r270 top value=137kR
R74 "137K" Res-0402 3597.25,3070.85 r90 top value=137kR
R75 "137K" Res-0402 2366.84,3068.71 r90 top value=137kR
R76 "10K" Res-0402 2454.53,939.98 r90 top
R77 "10K" Res-0402 3656.95,940.84 r90 top
R78 "10K" Res-0402 3647,3070.84 r270 top
R79 "10K" Res-0402 2416.59,3068.71 r270 top
R80 "560R" Res-0402 4952.29,751.35 r90 top
R81 "560R" Res-0402 5102.29,751.35 r90 top
SW1 "B3U-1000P" B3U-1000P -20.17,1576.08 r90 top
SW2 "DSIC02LSGET" DSIC02LSGET 235.29,1066.08 r270 top
SW3 "B3U-1000P" B3U-1000P -20.67,1827.03 r270 top
TP1 "TEST POINT" Test-point 5401.78,1563.93 r0 top
TP2 "TEST POINT" Test-point 181.82,539.63 r0 top
TP3 "TEST POINT" Test-point 866.29,1838.51 r0 top
TP4 "TEST POINT" Test-point 866.29,1935.63 r0 top
U1 "LM5156HPWPR" HTSSOP-14-EP 4409.26,1949.53 r0 top
U2 "LM74700QDBVRQ1" SOT-23-6 4806.2,3024.99 r0 top
U3 "AP63205WU-7" TSOT-23-6 1524.41,112.01 r180 top
U4 "TPS56637RPAR" "10-VQFN-HR (3x3)" 2851.5,2361.26 r0 top
U5 "ST1L05APU33R" DFN-6(3x3) 864.18,124.27 r0 top
U6 "TCAN3414DR" "SOIC-8(0.154\", 3.90mm Width)" 4758.99,948.75 r270 top
U7 "THVD1449DR" "SOIC-8(0.154\", 3.90mm Width)" 5027.29,948.75 r270 top
U8 "STM32F042G6U6" "28-UFQFPN (4x4)" 528.02,1697.44 r0 top
U9 "ULN2003AIDR" "16-SOIC (0.154\", 3.90mm Width)" 1267.29,1709.63 r0 top

## Footprints (in the part's own frame and the unit in brackets; to place one, negate y for a bottom-side part, rotate by r counter-clockwise, add the part's x,y. Pads: shape width x height; smd on the part's side, far side on the other; paste and mask are expansions set on the pad)
"8-VSON-CLIP (3.3x3.3)" [mm]
  rect 0.65x0.5 smd paste-100 mask+0.05: 1(-1.6,0.975) 2(-1.6,0.325) 3(-1.6,-0.325) 4(-1.6,-0.975)
  rect 0.7x0.5 smd paste-100 mask+0.05: 5(1.6,-0.975) 6(1.6,-0.325) 7(1.6,0.325) 8(1.6,0.975)
  rect 1.9x2.45 smd paste-100 mask+0.05: 8(0.44,0)
  silkscreen extent -2.16,-1.65 1.65,1.65, body extent -1.65,-1.65 1.65,1.65, height 1.1
"8-VSONP (5x6)" [mm]
  rect 0.82x0.7 smd paste-100 mask+0.051: 1(-2.75,1.907) 2(-2.75,0.637) 3(-2.75,-0.633) 4(-2.75,-1.903)
  rect 0.7x0.7 smd paste-100 mask+0.051: 5(2.75,-1.907) 6(2.75,-0.638) 7(2.75,0.632) 8(2.75,1.902)
  Top Layer region: -1.514,-2.28 2.439,-2.28 2.439,2.28 -1.514,2.28
  silkscreen extent -3.42,-2.54 3.05,2.54, body extent -3,-2.45 3,2.45, height 1.1
"10-VQFN-HR (3x3)" [mm]
  rect 0.6x0.25 smd paste+0 mask+0.07: 1(-1.175,0.75) 2(-1.175,0.25) 3(-1.175,-0.25) 4(-1.175,-0.75)
  rect 0.25x0.6 smd paste+0 mask+0.07: 5(-0.705,-1.4) 7(1.095,-1.4) 10(-0.705,1.4)
  rect 0.25x1.7 smd paste+0 mask+0.07: 6(0.595,-0.85)
  rrect50% 0.4x2.1 smd mask+0.07: 8(1.175,0.65)
  rect 0.4x2.1 smd paste+0 mask+0.07: 9(0.015,0.65)
  Top Layer region: 287 vertices and 0 holes, not listed, extent 0.975,-0.4 1.936,1.7
  silkscreen extent -1.76,-1.5 1.73,1.5, body extent -1.27,-1.5 1.73,1.5, height 1
"16-SOIC (0.154\", 3.90mm Width)" [mm]
  rect 1.5x0.58 smd: 1(-2.7,4.445) 2(-2.7,3.175) 3(-2.7,1.905) 4(-2.7,0.635) 5(-2.7,-0.635) 6(-2.7,-1.905) 7(-2.7,-3.175) 8(-2.7,-4.445) 9(2.7,-4.445) 10(2.7,-3.175) 11(2.7,-1.905) 12(2.7,-0.635) 13(2.7,0.635) 14(2.7,1.905) 15(2.7,3.175) 16(2.7,4.445)
  silkscreen extent -3.78,-5.03 2,5.03, body extent -3,-4.95 3,4.95, height 1.75
"28-UFQFPN (4x4)" [mm]
  rect 0.1x0.1 smd paste-1 mask+0: 1(-1.9,1.5) 7(-1.9,-1.5) 8(-1.5,-1.9) 14(1.5,-1.9) 15(1.9,-1.5) 21(1.9,1.5) 22(1.5,1.9) 28(-1.5,1.9)
  rect 0.55x0.3 smd mask+0.08: 2(-1.875,1) 3(-1.875,0.5) 4(-1.875,0) 5(-1.875,-0.5) 6(-1.875,-1) 16(1.875,-1) 17(1.875,-0.5) 18(1.875,0) 19(1.875,0.5) 20(1.875,1)
  rect 0.3x0.55 smd mask+0.08: 9(-1,-1.875) 10(-0.5,-1.875) 11(0,-1.875) 12(0.5,-1.875) 13(1,-1.875) 23(1,1.875) 24(0.5,1.875) 25(0,1.875) 26(-0.5,1.875) 27(-1,1.875)
  Top Layer region: -1.65,1.5 -1.65,1.35 -2.15,1.35 -2.15,1.65 -1.8,1.65
  Top Layer region: -1.65,-1.5 -1.8,-1.65 -2.15,-1.65 -2.15,-1.35 -1.65,-1.35
  Top Layer region: -1.35,-2.15 -1.65,-2.15 -1.65,-1.8 -1.5,-1.65 -1.35,-1.65
  Top Layer region: 1.65,-1.8 1.65,-2.15 1.35,-2.15 1.35,-1.65 1.5,-1.65
  Top Layer region: 2.15,-1.65 1.8,-1.65 1.65,-1.5 1.65,-1.35 2.15,-1.35
  Top Layer region: 2.15,1.35 1.65,1.35 1.65,1.5 1.8,1.65 2.15,1.65
  Top Layer region: 1.65,1.8 1.5,1.65 1.35,1.65 1.35,2.15 1.65,2.15
  Top Layer region: -1.35,1.65 -1.5,1.65 -1.65,1.8 -1.65,2.15 -1.35,2.15
  silkscreen extent -2.46,-2.03 2.03,2.03, body extent -2,-2 2,2, height 0.6
178.6165.0002 [mm]
  rect 2.2x2.2 hole 1.5 paste-2539.97 mask+0.051: 1(-6.4,1.25)
  round 2.2 hole 1.5 paste-2539.97 mask+0.051: 2(-2.9,1.25) 3(2.9,1.25) 4(6.4,1.25) 5(6.4,-1.25) 6(2.9,-1.25) 7(-2.9,-1.25) 8(-6.4,-1.25)
  round 0 hole 2.5 unplated paste-2539.97: ""(0,0)
  silkscreen extent -10.03,-3.05 10.03,3.05, body extent -10,-3 10,3, height 17.5
B3U-1000P [mm] "SWITCH TACTILE SPST-NO 0.05A 12V"
  rect 0.82x1.72 smd: 1(-1.7,0) 2(1.7,0)
  silkscreen extent -1.57,-1.3 1.57,1.3, body extent -2,-1.26 2,1.24, height 1.6
Cap-0402 [mil]
  rect 18x25 smd mask+2.36: 1(-18.5,0) 2(18.5,0)
  silkscreen extent -31,-16 31,16, body extent -20,-10 20,10, height 19
Cap-0603 [mil]
  rect 30x35 smd mask+2.36: 1(-30,0) 2(30,0)
  silkscreen extent -49,-21 49,21, body extent -32,-16 31,16, height 34
Cap-0805 [mil] "SMD 0805"
  rect 40x60 smd mask+2.76: 1(-40,0) 2(40,0)
  silkscreen extent -64,-34 64,34, body extent -39,-25 39,25, height 30
Cap-1206 [mil] "SMD 1206"
  rect 60x70 smd: 1(-50,0) 2(50,0)
  silkscreen extent -84,-39 84,39, body extent -63,-31 63,32, height 39
Cap-1210 [mil] "SMD 1210"
  rect 60x110 smd: 1(-50,0) 2(50,0)
  silkscreen extent -84,-59 84,59, body extent -63,-49 63,49, height 39
D2Pak. [mm]
  rect 2.08x3.81 smd: 1(-2.54,-5.335) 2(2.54,-5.335)
  rect 11.43x8.89 smd: 3(0,5.335)
  silkscreen extent -5.21,-5.46 5.11,0.51, body extent -5.08,-6.6 5.02,8.79, height 4.5
DB128L-5.08-2P-OG-S [mm]
  round 2.8 hole 1.6: 1(-2.54,0) 2(2.54,0)
  silkscreen extent -5.7,-5.1 5.1,4.95, body extent -5.68,-5.09 5.08,4.91, height 14
DB128L-5.08-3P-GY-S [mm]
  rect 2.4x2.4 hole 1.6 paste-2539.97 mask+0.051: 1(-5.08,0)
  round 2.4 hole 1.6 paste-2539.97 mask+0.051: 2(0,0) 3(5.08,0)
  silkscreen extent -7.62,-5.1 8.12,5, body extent -7.67,-5 8.17,5, height 14.1
DFN-2(0.3x0.6) [mm]
  rect 0.27x0.26 smd mask+0.05: 1(-0.195,0) 2(0.195,0)
  silkscreen extent -0.41,-0.2 0.41,0.2, body extent -0.3,-0.15 0.3,0.15, height 0.3
DFN-6(3x3) [mm]
  rect 0.8x0.5 smd paste+0 mask+0.051: 1(-1.6,0.95) 2(-1.6,0) 3(-1.6,-0.95) 4(1.6,-0.95) 5(1.6,0) 6(1.6,0.95)
  rect 1.55x2.3 smd paste+0 mask+0.051: 7(0,0)
  silkscreen extent -2.26,-1.52 1.52,1.52, body extent -1.5,-1.5 1.5,1.5, height 1.04
DSIC02LSGET [mm]
  rect 2.2x1.1 smd paste+0 mask+0.05: 1(-4.5,1.27) 2(-4.5,-1.27) 3(4.5,-1.27) 4(4.5,1.27)
  silkscreen extent -3,-2.5 3,2.6, body extent -4.65,-2.54 4.65,2.54, height 4.35
FEXL1010A-150M [mm]
  rect 3.4x11 smd: 1(-3.55,0) 2(3.55,0)
  silkscreen extent -5.5,-6 5.5,6, body extent -5.5,-5.95 5.5,5.95, height 7.7
Fuse-0805 [mm]
  rect 1x1.7 smd: 1(-1.1,0) 2(1.1,0)
  silkscreen extent -0.41,-0.81 0.41,0.81, body extent -1.1,-0.75 1.1,0.75, height 1.24
"G6RN-1 DC24" [mm]
  round 1.8 hole 1.2: 1(-3.81,12.7) 2(-3.81,-9.5) 3(3.81,-12.7) 4(3.81,-6.3) 5(3.81,12.7)
  silkscreen extent -5.08,-14.12 5.08,14.38, body extent -5,-14.15 5.01,14.35, height 14.5
HC-RJ45-5622-1-6-Y [mil]
  round 60 hole 39.37 paste-99999 mask+2: 1(175,175) 2(125,75) 3(74.99,175) 4(25,75) 5(-25,175) 6(-75,75) 7(-125.01,175) 8(-175,75)
  round 0 hole 125.98 unplated paste-99999: ""(-225,-175) ""(225,-175)
  silkscreen extent -300,-480 300,225, body extent -299,-478 299,223, height 465
HDR1X2_ [mm] "CONN HEADER VERT 2POS 2.54MM"
  rect 1.5x1.5 hole 0.9: 1(0,0)
  round 1.5 hole 0.9: 2(2.54,0)
  silkscreen extent -1.27,-1.27 3.81,1.27, body extent -1.27,-1.27 3.81,1.27, height 8.44
HDR1X3_ [mm] "Connector; Header; 3 Position"
  rect 1.5x1.5 hole 0.9: 1(0,0)
  round 1.5 hole 0.9: 2(2.54,0) 3(5.08,0)
  silkscreen extent -1.27,-1.27 6.35,1.27, body extent -1.27,-1.24 6.35,1.25, height 8.54
HTSSOP-14-EP [mm]
  rect 1.731x0.343 smd paste+0 mask+0.051: 1(-2.866,1.95) 2(-2.866,1.3) 3(-2.866,0.65) 4(-2.866,0) 5(-2.866,-0.65) 6(-2.866,-1.3) 7(-2.866,-1.95) 8(2.866,-1.95) 9(2.866,-1.3) 10(2.866,-0.65) 11(2.866,0) 12(2.866,0.65) 13(2.866,1.3) 14(2.866,1.95)
  rect 2.055x1.83 smd paste+0 mask+0.051: 15(0,0)
  silkscreen extent -4.06,-2.58 1.77,2.58, body extent -3.2,-2.49 3.2,2.49, height 1.3
IND-0402 [mm]
  rect 0.4x0.6 smd: 1(-0.35,0) 2(0.35,0)
  silkscreen extent -0.71,-0.46 0.71,0.46, body extent -0.5,-0.25 0.5,0.25, height 0.25
LED-0603 [mm]
  rect 0.5x1 smd: 1(-0.75,0) 2(0.75,0)
  silkscreen extent -1.12,-0.66 1.75,0.66, body extent -0.82,-0.37 0.82,0.36, height 0.68
MWSA1206S-6R8MT [mm]
  rect 3x6 smd paste+0 mask+0.051: 1(-6,0) 2(6,0)
  silkscreen extent -6.71,-6.33 6.69,6.28, body extent -6.73,-6.3 6.73,6.3, height 4.81
Res-0402 [mil]
  rect 18x25 smd mask+2.17: 1(-18.5,0) 2(18.5,0)
  silkscreen extent -32,-17 32,16, body extent -23,-11 23,11, height 16
Res-0603 [mil]
  rect 30x35 smd: 1(-30,0) 2(30,0)
  silkscreen extent -48,-21 48,21, body extent -31,-17 31,17, height 18
RES-0805 [mil] "SMD 0805"
  rect 40x50 smd: 1(-40,0) 2(40,0)
  silkscreen extent -64,-29 64,29, body extent -39,-25 39,24, height 24
RES-2512 [mm]
  rect 1.6x3.4 smd: 1(-3.25,0) 2(3.25,0)
  silkscreen extent -4.24,-1.85 4.24,1.85, body extent -3.17,-1.63 3.18,1.63, height 0.58
RVT1H470M0607 [mm]
  rect 3.5x1.6 smd: 1(-2.8,0) 2(2.8,0)
  silkscreen extent -4.27,-3.33 3.32,3.33, body extent -3.5,-3.3 3.5,3.3, height 7.7
SMB_ [mm]
  rect 2.8x2.4 smd: 1(-2.3,0) 2(2.3,0)
  silkscreen extent -2.21,-1.9 4.83,1.9, body extent -2.7,-1.8 2.7,1.8, height 2.3
SOD-123 [mm]
  rect 0.95x0.9 smd: 1(-1.575,0) 2(1.575,0)
  silkscreen extent -1.37,-0.8 2.82,0.8, body extent -1.82,-0.78 1.83,0.78, height 1.5
"SOIC-8(0.154\", 3.90mm Width)" [mm]
  rect 1.55x0.6 smd: 1(-2.7,1.905) 2(-2.7,0.635) 3(-2.7,-0.635) 4(-2.7,-1.905) 5(2.7,-1.905) 6(2.7,-0.635) 7(2.7,0.635) 8(2.7,1.905)
  silkscreen extent -3.79,-2.51 1.8,2.51, body extent -3.01,-2.45 3.01,2.45, height 1.63
SOT-23 [mm] "TRANS NPN 40V 0.6A SOT23"
  rect 0.82x0.92 smd: 1(-0.95,-1) 2(0.95,-1) 3(0,1)
  silkscreen extent -1.68,-1.3 1.55,0.81, body extent -1.5,-1.25 1.5,1.25, height 1.05
Sot-23 [mm] "TRANS NPN 40V 0.6A SOT23"
  rect 0.82x0.92 smd: 1(-0.95,-1) 2(0.95,-1) 3(0,1)
  silkscreen extent -1.68,-1.3 1.55,0.81, body extent -1.5,-1.25 1.5,1.25, height 1.05
SOT-23-6 [mm]
  rect 1.22x0.62 smd: 1(-1.31,0.95) 2(-1.31,0) 3(-1.31,-0.95) 4(1.31,-0.95) 5(1.31,0) 6(1.31,0.95)
  silkscreen extent -2.18,-1.52 0.86,1.52, body extent -1.5,-1.5 1.5,1.5, height 1.47
SOT-323-5 [mm]
  rect 1x0.35 smd: 1(-0.95,0.65) 2(-0.95,0) 3(-0.95,-0.65) 4(0.95,-0.65) 5(0.95,0.65)
  silkscreen extent -1.73,-1.12 0.51,1.12, body extent -1.05,-1.05 1.05,1.05, height 1
TC2030-IDC_ [mm] "CABLE ADAPTER 6 POS"
  round 0.787 smd: 1(-1.27,-0.635) 1(-1.27,-0.635) 2(-1.27,0.635) 3(0,-0.635) 4(0,0.635) 5(1.27,-0.635) 6(1.27,0.635)
  round 0 hole 2.375 unplated: MP1(-2.54,-2.54) MP2(0.635,-2.54) MP3(0.635,2.54) MP4(-2.54,2.54)
  round 0 hole 0.991 unplated: MP5(-2.54,0) MP6(2.54,-1.016) MP7(2.54,1.016)
  silkscreen extent -3.86,-3.86 3.2,3.86
Test-point [mil]
  oct 60x60 smd: 1(0,0)
  silkscreen extent -37,-37 37,37
TO-277A [mm]
  rect 1.6x1.4 smd paste+0 mask+0.05: 1(2,1.065) 2(2,-1.065)
  rect 5.05x4.8 smd paste+0 mask+0.05: 3(-2,0)
  silkscreen extent 0.76,-2.15 2.7,2.15, body extent -4.1,-2.3 2.4,2.3, height 1.12
TSOT-23-6 [mm]
  rect 1x0.6 smd: 1(-1.2,0.95) 2(-1.2,0) 3(-1.2,-0.95) 4(1.2,-0.95) 5(1.2,0) 6(1.2,0.95)
  silkscreen extent -1.98,-1.5 0.86,1.5, body extent -1.41,-1.45 1.41,1.45, height 1
UCD-220uF-10mmDia [mm] "0.406\" L x 0.406\" W (10.30mm x 10.30mm)"
  rect 4x2.5 smd: 1(-4,0) 2(4,0)
  silkscreen extent -5.95,-5.21 5.13,5.21, body extent -5.45,-5.15 5.45,5.15, height 10.8
WS2812D-F5 [mm]
  round 1.1 hole 0.72 paste-2539.97 mask+0.051: 1(1.95,0) 2(0.65,0) 3(-0.65,0) 4(-1.95,0)
  silkscreen extent -2.91,-2.9 2.51,2.9, body extent -2.9,-2.9 2.51,2.9, height 8.7
X6521WV-2x03H-C60D30 [mm]
  rect 1.8x1.8 hole 1.05 paste-2539.97 mask+0.051: 1(-2.54,-1.27)
  round 1.8 hole 1.05 paste-2539.97 mask+0.051: 2(-2.54,1.27) 3(0,-1.27) 4(0,1.27) 5(2.54,-1.27) 6(2.54,1.27)
  silkscreen extent -3.81,-2.54 3.81,2.54, body extent -3.81,-2.54 3.81,2.54, height 8.5
YPRH0703-4R7M [mm]
  rect 1.6x2.2 smd: 1(-3.2,0) 2(3.2,0)
  silkscreen extent -3.65,-3.65 3.65,3.65, body extent -3.66,-3.66 3.66,3.66, height 4.2

## Part data
C1 C2 C22 C24 C25 C26 C44 C45: library part UMK316AB7475KL-T, "CAP CER 4.7UF 50V X7R 1206", Case Code (Imperial)=1206, Case Code (Metric)=3216, Dielectric=X7R, LCSC Part Number=C92853, Manufacturer="Taiyo Yuden", Max Operating Temperature=125°C, Min Operating Temperature=-55°C, Package Quantity=2000, Tolerance=10%, Voltage Rating=50V, Case/Package=1206, ComponentLink1Description=https://datasheet.ciiva.com/170/umk316ab7475kl-t-ss-170928.pdf?src-supplier=Digikey, ComponentLink1URL=https://datasheet.ciiva.com/170/umk316ab7475kl-t-ss-170928.pdf?src-supplier=Digikey, ComponentLink2Description=https://datasheet.ciiva.com/2990/umk316ab7475kl-t-ss-2990070.pdf?src-supplier=Avnet, ComponentLink2URL=https://datasheet.ciiva.com/2990/umk316ab7475kl-t-ss-2990070.pdf?src-supplier=Avnet, ComponentLink3Description=https://datasheet.ciiva.com/15922/1010umk316ab7475kl-t-15922628.pdf?src-supplier=Onlinecomponents.com, ComponentLink3URL=https://datasheet.ciiva.com/15922/1010umk316ab7475kl-t-15922628.pdf?src-supplier=Onlinecomponents.com, ComponentLink4Description=https://datasheet.ciiva.com/7975/1481447-7975911.pdf?src-supplier=Element14, ComponentLink4URL=https://datasheet.ciiva.com/7975/1481447-7975911.pdf?src-supplier=Element14, ComponentLink5Description=https://datasheet.ciiva.com/5413/mlcc-all-e-541559-5413006.pdf?src-supplier=Mouser, ComponentLink5URL=https://datasheet.ciiva.com/5413/mlcc-all-e-541559-5413006.pdf?src-supplier=Mouser, Construction=Flat, Depth=1.6mm, Height=1.6mm, Item Type=Capacitor, Length=3.2mm, Manufacturer Part Number=UMK316AB7475KL-T, Mounting Technology="Surface Mount", Packaging="Tape and Reel", Pins=2, Pricing="1=0.3, 10=0.198, 50=0.146, 100=0.1189, 500=0.09386, 1000=0.07925 (USD)", Radiation Hardening=No, Reach SVHC Compliant=Unknown, RoHS=Yes, RoHS Compliant=Yes, Series=M, Stock=392550, Supplier=Digikey, Termination=SMD/SMT, Voltage Rating (DC)=50V, Width=1.6mm
C3 C4 C5: library part FS32X106K101EGG, "100V 10uF X7R ±10% 1210 Multilayer Ceramic Capacitors MLCC - SMD/SMT ROHS", LCSC Part Number=C5156756, Manufacturer="PSA(Prosperity Dielectrics)", Package=1210, ComponentLink1Description=LCSC, ComponentLink1URL=https://www.lcsc.com/product-detail/Multilayer-Ceramic-Capacitors-MLCC-SMD-SMT_PSA-Prosperity-Dielectrics-FS32X106K101EGG_C5156756.html, Item Type=Capacitor, Manufacturer Part Number=FS32X106K101EGG
C6: library part GRM31CR72A105KA01K, "CAP CER 1UF 100V X7R 1206", Case Code (Imperial)=1206, Case Code (Metric)=3216, Dielectric=X7R, LCSC Part Number=C909823, Manufacturer=Murata, Max Operating Temperature=125°C, Min Operating Temperature=-55°C, Package Quantity=1, Supplier Part Number 1=490-6523-1-ND, Tolerance=10%, Voltage Rating=100V, Capacitance=1uF, Case/Package=1206, Category="Ceramic Capacitors", ComponentLink1Description=https://datasheet.ciiva.com/11616/product-11616604.pdf?src-supplier=Avnet, ComponentLink1URL=https://datasheet.ciiva.com/11616/product-11616604.pdf?src-supplier=Avnet, ComponentLink2Description=https://datasheet.ciiva.com/6264/partnumbering-e-01-6264397.pdf?src-supplier=Digi-Key, ComponentLink2URL=https://datasheet.ciiva.com/6264/partnumbering-e-01-6264397.pdf?src-supplier=Digi-Key, ComponentLink3Description=https://datasheet.ciiva.com/6264/partnumbering-e-01-6264398.pdf?src-supplier=Digi-Key, ComponentLink3URL=https://datasheet.ciiva.com/6264/partnumbering-e-01-6264398.pdf?src-supplier=Digi-Key, ComponentLink4Description=https://datasheet.ciiva.com/6264/partnumbering-e-01-6264399.pdf?src-supplier=Digi-Key, ComponentLink4URL=https://datasheet.ciiva.com/6264/partnumbering-e-01-6264399.pdf?src-supplier=Digi-Key, Construction=Flat, Depth=1.6mm, Height=1.6mm, Length=3.2mm, Manufacturer Part Number=GRM31CR72A105KA01K, Mount="Surface Mount", Packaging="Tape and Reel", Pricing 1="1=0.48000, 10=0.33000, 50=0.23100, 100=0.19800, 500=0.14850, 1000=0.12540, 2500=0.11880 (USD)", Radiation Hardening=No, RoHS=Yes, RoHS Compliant=Yes, Series=GRM, Stock 1=11842, Supplier 1=Digi-Key, Termination=SMD/SMT, Thickness=0.071inch, Voltage Rating (DC)=100V, Width=1.6mm
C7: library part UCD1H221MNL1GS, "CAP ALUM 220UF 20% 50V SMD", Case/Package=Radial, LCSC Part Number=C116211, Leakage Current=3uA, Manufacturer=Nichicon, Max Operating Temperature=105°C, Min Operating Temperature=-55°C, Package Quantity=1, Ripple Current=700mA, Supplier Part Number 1=493-6390-1-ND, Tolerance=20%, Voltage=50V, Capacitance=220uF, Category="Aluminum Electrolytic Capacitors", ComponentLink1Description=https://datasheet.ciiva.com/11776/0900766b80ebdadd-11776792.pdf?src-supplier=RSComponents, ComponentLink1URL=https://datasheet.ciiva.com/11776/0900766b80ebdadd-11776792.pdf?src-supplier=RSComponents, ComponentLink2Description=https://datasheet.ciiva.com/5362/e-cd-22158-5362489.pdf?src-supplier=Mouser, ComponentLink2URL=https://datasheet.ciiva.com/5362/e-cd-22158-5362489.pdf?src-supplier=Mouser, ComponentLink3Description=https://datasheet.ciiva.com/11684/e-cd-11684678.pdf?src-supplier=Avnet, ComponentLink3URL=https://datasheet.ciiva.com/11684/e-cd-11684678.pdf?src-supplier=Avnet, ComponentLink4Description=https://datasheet.ciiva.com/15037/e-cd-15037119.pdf?src-supplier=Digi-Key, ComponentLink4URL=https://datasheet.ciiva.com/15037/e-cd-15037119.pdf?src-supplier=Digi-Key, ComponentLink5Description=https://datasheet.ciiva.com/16393/e-cd-16393493.pdf?src-supplier=Future+Electronics, ComponentLink5URL=https://datasheet.ciiva.com/16393/e-cd-16393493.pdf?src-supplier=Future+Electronics, ComponentLink6Description=https://datasheet.ciiva.com/17354/e-cd-17354606.pdf?src-supplier=Avnet+Europe, ComponentLink6URL=https://datasheet.ciiva.com/17354/e-cd-17354606.pdf?src-supplier=Avnet+Europe, Construction=Cylindrical, Diameter=10mm, Dissipation Factor=0.1%, Features="General Purpose", Height=10mm, Height - Seated (Max)=0.394inch, Impedance=160mR, Item Type=Capacitor, Lead Free="Lead Free", Length=10mm, Life (Hours)=5000Hour, Manufacturer Part Number=UCD1H221MNL1GS, Mount="Surface Mount,PCB", Packaging="Tape and Reel", Pricing 1="1=0.85000, 10=0.60200, 50=0.45480, 100=0.39620 (USD)", Radiation Hardening=No, RoHS=Yes, RoHS Compliant=Yes, Series=CD, Supplier 1=Digi-Key, Termination=SMD/SMT, Voltage Rating=50V, Voltage Rating (DC)=50V
C8: library part RVT1H470M0607, "47uF 50V 66mA@120Hz ±20% SMD,D6.3xL7.7mm Aluminum Electrolytic Capacitors - SMD ROHS", LCSC Part Number=C72523, Manufacturer=ROQANG, Package=SMD,D6.3xL7.7mm, ComponentLink1Description=LCSC, ComponentLink1URL=https://www.lcsc.com/product-detail/Aluminum-Electrolytic-Capacitors-SMD_ROQANG-RVT1H470M0607_C72523.html, Item Type=Capacitor, Manufacturer Part Number=RVT1H470M0607
C9: library part CC0805JRX7R0BB223, "CAP CER 0.022UF 100V X7R 0805", Case/Package=0805, Dielectric=X7R, LCSC Part Number=C576993, Manufacturer=Yageo, Max Operating Temperature=125°C, Min Operating Temperature=-55°C, Tolerance=5%, ComponentLink1Description=https://datasheet.ciiva.com/11494/upy-np0x7r-mv-100-to-630v-9-11494760.pdf?src-supplier=Avnet, ComponentLink1URL=https://datasheet.ciiva.com/11494/upy-np0x7r-mv-100-to-630v-9-11494760.pdf?src-supplier=Avnet, Construction=Flat, Depth=1.25mm, Height=0.85mm, Item Type=Capacitors, Length=2mm, Manufacturer Part Number=CC0805JRX7R0BB223, Mounting Technology="Surface Mount", Pricing="1=0.13, 10=0.07, 50=0.0488, 100=0.0421, 500=0.03086, 1000=0.02736 (USD)", RoHS=Yes, RoHS Compliant=Yes, Stock=2257, Supplier=Digikey
C10 C23: library part GRM21BR61H106ME43L, "CAP CER 10UF 50V X5R 0805", LCSC Part Number=C2190942, Manufacturer=Murata, Supplier Part Number 1=490-18664-1-ND, Category="Ceramic Capacitors", Manufacturer Part Number=GRM21BR61H106ME43L, Pricing 1="1=0.44000, 10=0.30700, 50=0.21500, 100=0.18420, 500=0.13818, 1000=0.11668 (USD)", RoHS=Yes, Stock 1=26, Supplier 1=Digi-Key
C11 C14: library part CL10A105KB8NNNC, "CAP CER 1UF 50V X5R 0603", Case Code (Imperial)=0603, Case Code (Metric)=1608, Dielectric=X5R, LCSC Part Number=C15849, Manufacturer=Samsung, Max Operating Temperature=85°C, Min Operating Temperature=-55°C, Tolerance=10%, Voltage Rating=50V, Case/Package=0603, Category="Ceramic Capacitors", ComponentLink1Description=https://datasheet.ciiva.com/26877/getdatasheetpartid-753736-26877879.pdf?src-supplier=Verical, ComponentLink1URL=https://datasheet.ciiva.com/26877/getdatasheetpartid-753736-26877879.pdf?src-supplier=Verical, Depth=0.8mm, Item Type=Capacitor, Length=1.6mm, Manufacturer Part Number=CL10A105KB8NNNC, Material=4241ConductorMaterial, Mounting Technology="Surface Mount", Packaging="Tape and Reel", Pricing="4000=0.01632, 8000=0.01595, 16000=0.01557, 24000=0.0152, 32000=0.01482 (USD)", Radiation Hardening=No, RoHS=Yes, RoHS Compliant=Yes, Series=CL, Stock=780446, Supplier=Avnet, Supplier Part Number=CL10A105KB8NNNC, Voltage Rating (DC)=50V
C12 C16 C20 C42: library part CL10B104KB8WPNC, "CAP CER 0.1UF 50V X7R 0603", Case Code (Imperial)=0603, Case Code (Metric)=1608, LCSC Part Number=C307348, Max Operating Temperature=125°C, Min Operating Temperature=-55°C, Ratings=AEC-Q200, Supplier Part Number=2575919, Tolerance=10%, Voltage Rating=50V, Case/Package=0603, Category="Ceramic Capacitors", ComponentLink1Description=LCSC, ComponentLink2Description=http://www.farnell.com/datasheets/2710560.pdf?src-supplier=Farnell, ComponentLink2URL=http://www.farnell.com/datasheets/2710560.pdf?src-supplier=Farnell, ComponentLink3Description=http://www.samsungsem.com/kr/support/product-search/mlcc/CL10B104KB8WPNC.jsp?src-supplier=Digi-Key, ComponentLink3URL=http://www.samsungsem.com/kr/support/product-search/mlcc/CL10B104KB8WPNC.jsp?src-supplier=Digi-Key, ComponentLink4Description=http://www.farnell.com/datasheets/2710560.pdf?src-supplier=Element14, ComponentLink4URL=http://www.farnell.com/datasheets/2710560.pdf?src-supplier=Element14, ComponentLink5Description=https://datasheet.octopart.com/CL10B104KB8WPNC-Samsung-Electro-Mechanics-datasheet-120093645.pdf?src-supplier=Future+Electronics, ComponentLink5URL=https://datasheet.octopart.com/CL10B104KB8WPNC-Samsung-Electro-Mechanics-datasheet-120093645.pdf?src-supplier=Future+Electronics, ComponentLink6Description=http://www.farnell.com/datasheets/2710560.pdf?src-supplier=Newark, ComponentLink6URL=http://www.farnell.com/datasheets/2710560.pdf?src-supplier=Newark, ComponentLink7Description=http://www.samsungsem.com/servlet/FileDownload?type=spec&file=CL10B104KB8WPNC.pdf&src-supplier=Avnet, ComponentLink7URL=http://www.samsungsem.com/servlet/FileDownload?type=spec&file=CL10B104KB8WPNC.pdf&src-supplier=Avnet, ComponentLink8Description=https://datasheet.octopart.com/CL10B104KB8WPNC-Samsung-datasheet-8326407.pdf?src-supplier=TME, ComponentLink8URL=https://datasheet.octopart.com/CL10B104KB8WPNC-Samsung-datasheet-8326407.pdf?src-supplier=TME, Height=900um, Item Type=Capacitor, Lead Free=5697LeadFree, Material=4241ConductorMaterial, Mounting Technology="Surface Mount", Packaging="Cut Tape", Pricing="100=0.021, 500=0.019, 1000=0.015, 2000=0.01 (GBP)", RoHS=Yes, RoHS Compliant=Yes, Series=CL, Stock=400, Supplier=Rs, Voltage Rating (DC)=50V
C13: library part CC0402KRX5R8BB105, "CAP CER 1UF 25V X5R 0402", Case Code (Imperial)=0402, Case Code (Metric)=1005, Dielectric=X5R, LCSC Part Number=C326568, Manufacturer=Yageo, Max Operating Temperature=85°C, Min Operating Temperature=-55°C, Package Quantity=10000, Supplier Part Number 1=603-CC402KRX5R8BB105, Tolerance=10%, Voltage Rating=25V, Capacitance=1uF, Case/Package=0402, Category="Ceramic Capacitors", ComponentLink1Description=http://www.mouser.com/ds/2/447/Yageo_UPY-GP_NP0_16V-to-50V_9-358835.pdf?src-supplier=Mouser, ComponentLink1URL=http://www.mouser.com/ds/2/447/Yageo_UPY-GP_NP0_16V-to-50V_9-358835.pdf?src-supplier=Mouser, ComponentLink2Description=http://www.yageo.com/documents/recent/UPY-GPHC_X5R_4V-to-50V_25.pdf?src-supplier=Digi-Key, ComponentLink2URL=http://www.yageo.com/documents/recent/UPY-GPHC_X5R_4V-to-50V_25.pdf?src-supplier=Digi-Key, ComponentLink3Description=https://4donline.ihs.com/images/VipMasterIC/IC/YAGO/YAGO-S-A0006851646/YAGO-S-A0006851646-1.pdf?hkey=6D3A4C79FDBF58556ACFDE234799DDF0&src-supplier=Newark, ComponentLink3URL=https://4donline.ihs.com/images/VipMasterIC/IC/YAGO/YAGO-S-A0006851646/YAGO-S-A0006851646-1.pdf?hkey=6D3A4C79FDBF58556ACFDE234799DDF0&src-supplier=Newark, Halogen Free="Halogen Free", Lead Free="Lead Free", Length=0.039inch, Manufacturer Part Number=CC0402KRX5R8BB105, Mount="Surface Mount", Packaging="Tape and Reel", Pricing 1="1=0.30000, 10=0.20400, 50=0.20400, 100=0.11600, 1000=0.07200, 10000=0.05900 (USD)", RoHS=Yes, RoHS Compliant=Yes, Stock 1=91975, Supplier 1=Mouser, Termination=SMD/SMT, Thickness=0.022inch, Voltage Rating (DC)=25V, Weight=2.3E-05oz, Width=0.02inch
C15: library part CC0402KRX7R8BB333, "CAP CER 0.033UF 25V X7R 0402", Case Code (Imperial)=0402, Case Code (Metric)=1005, Dielectric=X7R, LCSC Part Number=C326974, Manufacturer=Yageo, Max Operating Temperature=125°C, Min Operating Temperature=-55°C, Supplier Part Number=4094394, Temperature Coefficient=30ppm/°C, Tolerance=10%, Voltage Rating=25V, Case/Package=0402, ComponentLink1Description=https://datasheet.ciiva.com/13264/upy-gphc-x7r-6-3v-to-50v-8-12304-13264253.pdf?src-supplier=Mouser, ComponentLink1URL=https://datasheet.ciiva.com/13264/upy-gphc-x7r-6-3v-to-50v-8-12304-13264253.pdf?src-supplier=Mouser, Halogen Free="Halogen Free", Item Type=Capacitor, Lead Free="Lead Free", Length=0.039inch, Manufacturer Part Number=CC0402KRX7R8BB333, Material=4241ConductorMaterial, Mounting Technology="Surface Mount", Packaging="Tape and Reel", Pricing="10000=0.004, 40000=0.0038, 150000=0.0036, 250000=0.0035, 500000=0.0033 (USD)", RoHS=Yes, RoHS Compliant=Yes, Series=CC, Stock=50000, Supplier="Future Electronics", Termination=SMD/SMT, Thickness=0.022inch, Voltage Rating (DC)=25V, Weight=2.3E-05oz, Width=0.02inch
C17: library part CL05B104KB54PNC, "CAP CER 0.1UF 50V X7R 0402", LCSC Part Number=C307331, Manufacturer=Samsung, Supplier Part Number 1=1276-CL05B104KB54PNCDKR-ND, Item Type=Capacitor, Manufacturer Part Number=CL05B104KB54PNC, Pricing 1="1=0.1, 10=0.067, 50=0.0366, 100=0.0299, 500=0.02138, 1000=0.01681, 2500=0.01528, 5000=0.01406 (USD)", Stock 1=8594, Supplier 1=Digi-Key
C18: library part CC0402KRX7R9BB683, "CAP CER 0.068UF 50V X7R 0402", Case/Package=343Case, Dielectric=1511DielectricType, Manufacturer=Yageo, Supplier Part Number 1=2106471, Voltage Rating (DC)=50V, Capacitance=68nF, Category="Ceramic Capacitors", Halogen Free=5694HalogenFree, Item Type=Capacitor, Lead Free=5697LeadFree, Manufacturer Part Number=CC0402KRX7R9BB683, Pricing 1="10000=0.0035, 40000=0.0033, 100000=0.0032, 250000=0.0031, 400000=0.0029 (USD)", RoHS=Yes, Stock 1=100000, Supplier 1="Future Electronics"
C19: library part CC0402KRX7R9BB102, "CAP CER 1000PF 50V X7R 0402", Case Code (Imperial)=0402, Case Code (Metric)=1005, Dielectric Material=4241ConductorMaterial, Insulation Resistance=100GR, LCSC Part Number=C106205, Manufacturer=Yageo, Max Operating Temperature=125°C, Min Operating Temperature=-55°C, Temperature Coefficient=30ppm/°C, Tolerance=10%, Voltage Rating=50V, Case/Package=0402, ComponentLink1Description=https://datasheet.ciiva.com/11786/0900766b8079c870-11786157.pdf?src-supplier=Rs, ComponentLink1URL=https://datasheet.ciiva.com/11786/0900766b8079c870-11786157.pdf?src-supplier=Rs, ComponentLink2Description=https://datasheet.ciiva.com/7978/1489800-7978092.pdf?src-supplier=Element14, ComponentLink2URL=https://datasheet.ciiva.com/7978/1489800-7978092.pdf?src-supplier=Element14, ComponentLink3Description=https://datasheet.ciiva.com/22749/1489800-22749213.pdf?src-supplier=Element14, ComponentLink3URL=https://datasheet.ciiva.com/22749/1489800-22749213.pdf?src-supplier=Element14, ComponentLink4Description=https://datasheet.ciiva.com/143/mlccorderingcode-143957.pdf?src-supplier=Digikey, ComponentLink4URL=https://datasheet.ciiva.com/143/mlccorderingcode-143957.pdf?src-supplier=Digikey, ComponentLink5Description=https://datasheet.ciiva.com/143/mlccorderingcode-143956.pdf?src-supplier=Digikey, ComponentLink5URL=https://datasheet.ciiva.com/143/mlccorderingcode-143956.pdf?src-supplier=Digikey, ComponentLink6Description=https://datasheet.ciiva.com/143/mlccorderingcode-143958.pdf?src-supplier=Digikey, ComponentLink6URL=https://datasheet.ciiva.com/143/mlccorderingcode-143958.pdf?src-supplier=Digikey, ComponentLink7Description=https://datasheet.ciiva.com/13389/upy-gp-np0-16v-to-50v-8-13389974.pdf?src-supplier=Mouser, ComponentLink7URL=https://datasheet.ciiva.com/13389/upy-gp-np0-16v-to-50v-8-13389974.pdf?src-supplier=Mouser, ComponentLink8Description=https://datasheet.ciiva.com/15189/getdatasheetpartid-403474-15189131.pdf?src-supplier=Verical, ComponentLink8URL=https://datasheet.ciiva.com/15189/getdatasheetpartid-403474-15189131.pdf?src-supplier=Verical, Halogen Free=5694HalogenFree, Item Type=Capacitors, Lead Free=5697LeadFree, Length=0.039inch, Manufacturer Part Number=CC0402KRX7R9BB102, Material=4241ConductorMaterial, Mounting Technology="Surface Mount", Packaging="Cut Tape", RoHS=Yes, RoHS Compliant=Yes, Series=CC, Stock=16500, Supplier=Rs, Thickness=0.022inch, Voltage Rating (AC)=50V, Width=0.02inch
C21: library part CC0603KRX5R9BB104, "CAP CER 0.1UF 50V X5R 0603", Case Code (Imperial)=0603, Case Code (Metric)=1608, Dielectric=X5R, LCSC Part Number=C110022, Manufacturer=Yageo, Max Operating Temperature=85°C, Min Operating Temperature=-55°C, Package Quantity=4000, Supplier Part Number 1=311-4046-1-ND, Tolerance=10%, Voltage Rating=50V, Capacitance=100nF, Case/Package=0603, Category="Ceramic Capacitors", ComponentLink1Description=http://www.mouser.com/ds/2/447/Yageo_UPY-GP_NP0_16V-to-50V_9-358835.pdf?src-supplier=Mouser, ComponentLink1URL=http://www.mouser.com/ds/2/447/Yageo_UPY-GP_NP0_16V-to-50V_9-358835.pdf?src-supplier=Mouser, ComponentLink2Description=https://www.yageo.com/upload/media/product/productsearch/datasheet/mlcc/UPY-GPHC_X5R_4V-to-50V_26.pdf?src-supplier=Digi-Key, ComponentLink2URL=https://www.yageo.com/upload/media/product/productsearch/datasheet/mlcc/UPY-GPHC_X5R_4V-to-50V_26.pdf?src-supplier=Digi-Key, ComponentLink3Description=http://www.yageo.com/exep/pages/download/literatures/ProductSelectionGuide%202014_Final_2.pdf?src-supplier=Digi-Key, ComponentLink3URL=http://www.yageo.com/exep/pages/download/literatures/ProductSelectionGuide%202014_Final_2.pdf?src-supplier=Digi-Key, Halogen Free="Halogen Free", Item Type=Capacitor, Lead Free="Lead Free", Length=0.063inch, Manufacturer Part Number=CC0603KRX5R9BB104, Mount="Surface Mount", Packaging="Tape and Reel", Pricing 1="1=0.10000, 10=0.05200, 50=0.02820, 100=0.02310, 500=0.01648, 1000=0.01294 (USD)", RoHS=Yes, Stock 1=152253, Supplier 1=Digi-Key, Termination=SMD/SMT, Thickness=0.035inch, Voltage Rating (DC)=50V, Weight=7.1E-05oz, Width=0.031inch
C27 C28 C29 C30 C31 C32 C33 C34 C35 C36: library part CC0402KRX7R9BB103, "CAP CER 10000PF 50V X7R 0402", Case Code (Imperial)=0402, Case Code (Metric)=1005, Dielectric=X7R, LCSC Part Number=C60133, Manufacturer=Yageo, Max Operating Temperature=125°C, Min Operating Temperature=-55°C, Package Quantity=1, Resistor Type=Ceramic, Tolerance=10%, Voltage=50V, Capacitance=10nF, Case/Package=0402, Category="Ceramic Capacitors", ComponentLink1Description=https://datasheet.ciiva.com/11788/0900766b8079c870-11788375.pdf?src-supplier=RSComponents, ComponentLink1URL=https://datasheet.ciiva.com/11788/0900766b8079c870-11788375.pdf?src-supplier=RSComponents, ComponentLink2Description=https://datasheet.ciiva.com/26862/getdatasheetpartid-138248-26862642.pdf?src-supplier=Verical, ComponentLink2URL=https://datasheet.ciiva.com/26862/getdatasheetpartid-138248-26862642.pdf?src-supplier=Verical, ComponentLink3Description=https://datasheet.ciiva.com/7978/1489800-7978093.pdf?src-supplier=Element14, ComponentLink3URL=https://datasheet.ciiva.com/7978/1489800-7978093.pdf?src-supplier=Element14, ComponentLink4Description=https://datasheet.ciiva.com/28450/1489800-28450377.pdf?src-supplier=Element14, ComponentLink4URL=https://datasheet.ciiva.com/28450/1489800-28450377.pdf?src-supplier=Element14, ComponentLink5Description=https://datasheet.ciiva.com/176/mlccorderingcode-176349.pdf?src-supplier=Digi-Key, ComponentLink5URL=https://datasheet.ciiva.com/176/mlccorderingcode-176349.pdf?src-supplier=Digi-Key, ComponentLink6Description=https://datasheet.ciiva.com/176/mlccorderingcode-176348.pdf?src-supplier=Digi-Key, ComponentLink6URL=https://datasheet.ciiva.com/176/mlccorderingcode-176348.pdf?src-supplier=Digi-Key, ComponentLink7Description=https://datasheet.ciiva.com/176/mlccorderingcode-176350.pdf?src-supplier=Digi-Key, ComponentLink7URL=https://datasheet.ciiva.com/176/mlccorderingcode-176350.pdf?src-supplier=Digi-Key, Depth=0.5mm, Halogen Free="Halogen Free", Height=0.5mm, Item Type=Capacitor, Lead Free="Lead Free", Length=1mm, Manufacturer Part Number=CC0402KRX7R9BB103, Mount="Surface Mount", Packaging="Tape and Reel", Pricing 1="10000=0.00178 (USD)", Radiation Hardening=No, Reach SVHC Compliant=Yes, RoHS=Yes, RoHS Compliant=Yes, Series=CC, Stock 1=995000, Supplier 1=Avnet, Supplier Part Number 1=CC0402KRX7R9BB103, Termination=SMD/SMT, Thickness=0.022inch, Voltage Rating=50V, Voltage Rating (DC)=50V, Width=0.02inch